# Altium PCB NEXUS32.PcbDoc (part 1 of 3)
Units mil, origin at the board's own origin, x right, y up, seen from the top; angles counter-clockwise.
Board outline 6299 x 4724 mil, 4 copper layers (Top Layer, L2_GND, L3_PWR, Bottom Layer), stack 63.6 mil thick; 220 components, 128 nets, 690 pads, 369 vias.
Unrouted connection lines stored in the file: 1.
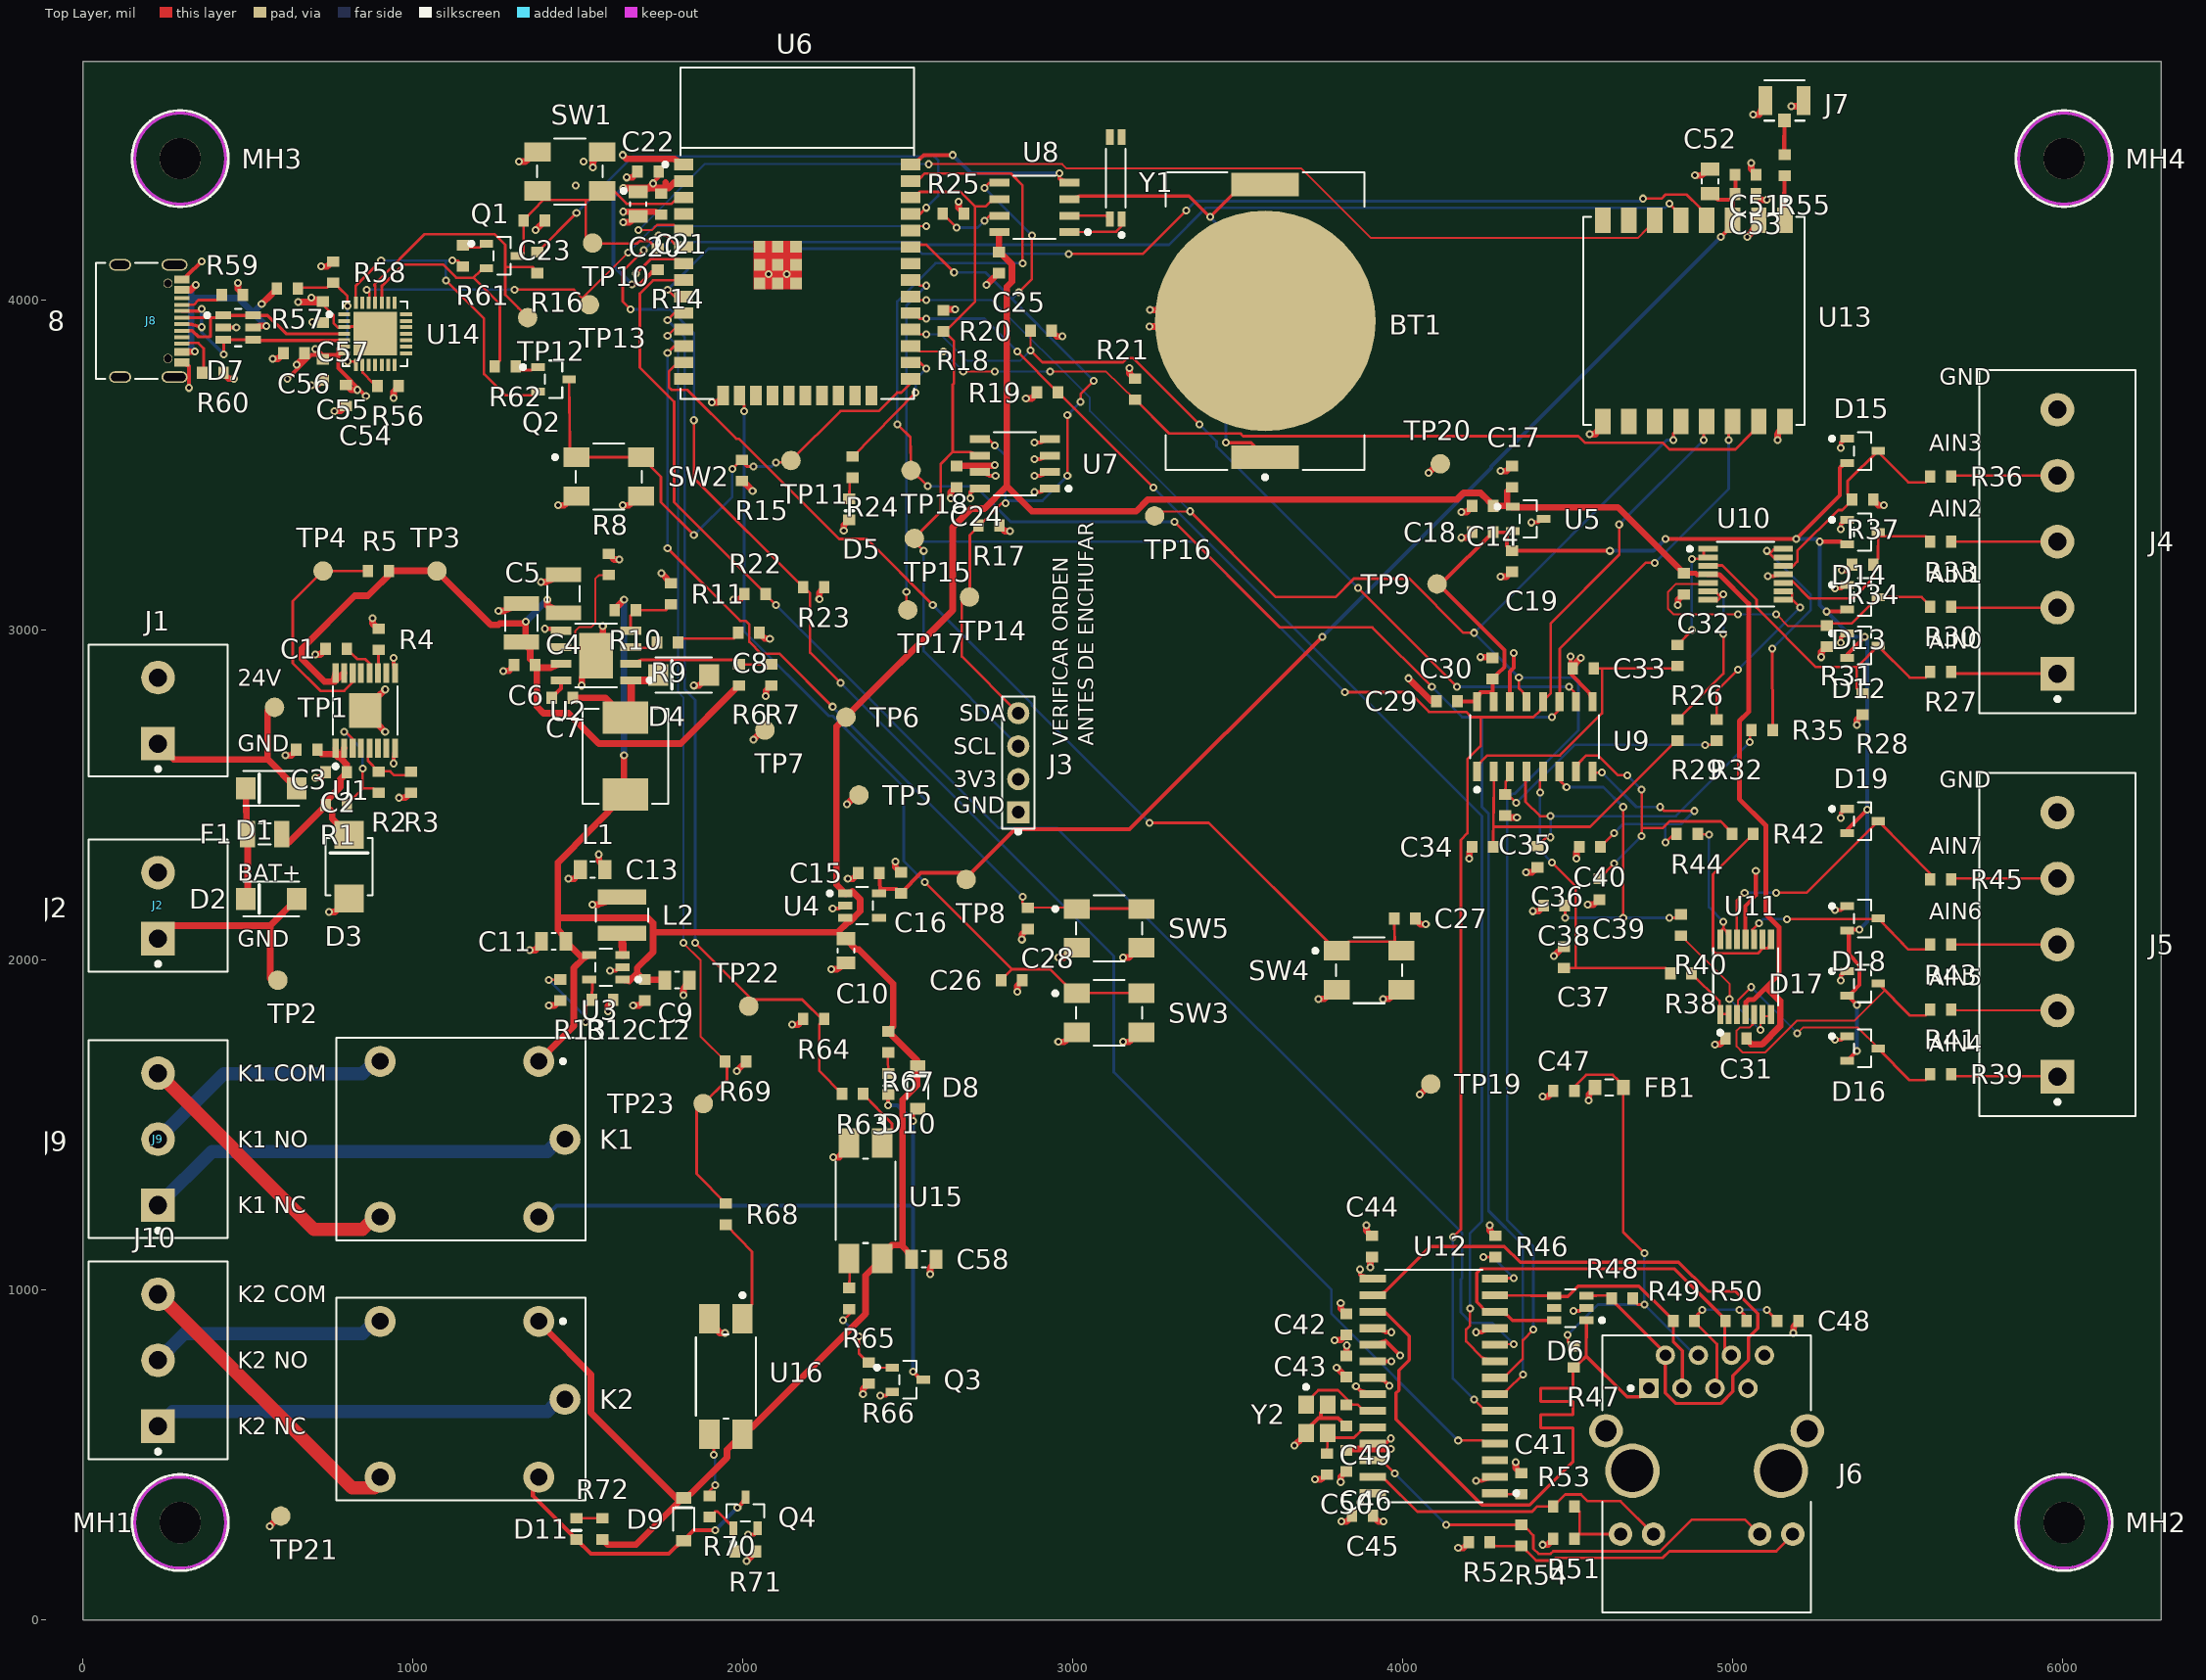
[diagram p0: Top Layer view]
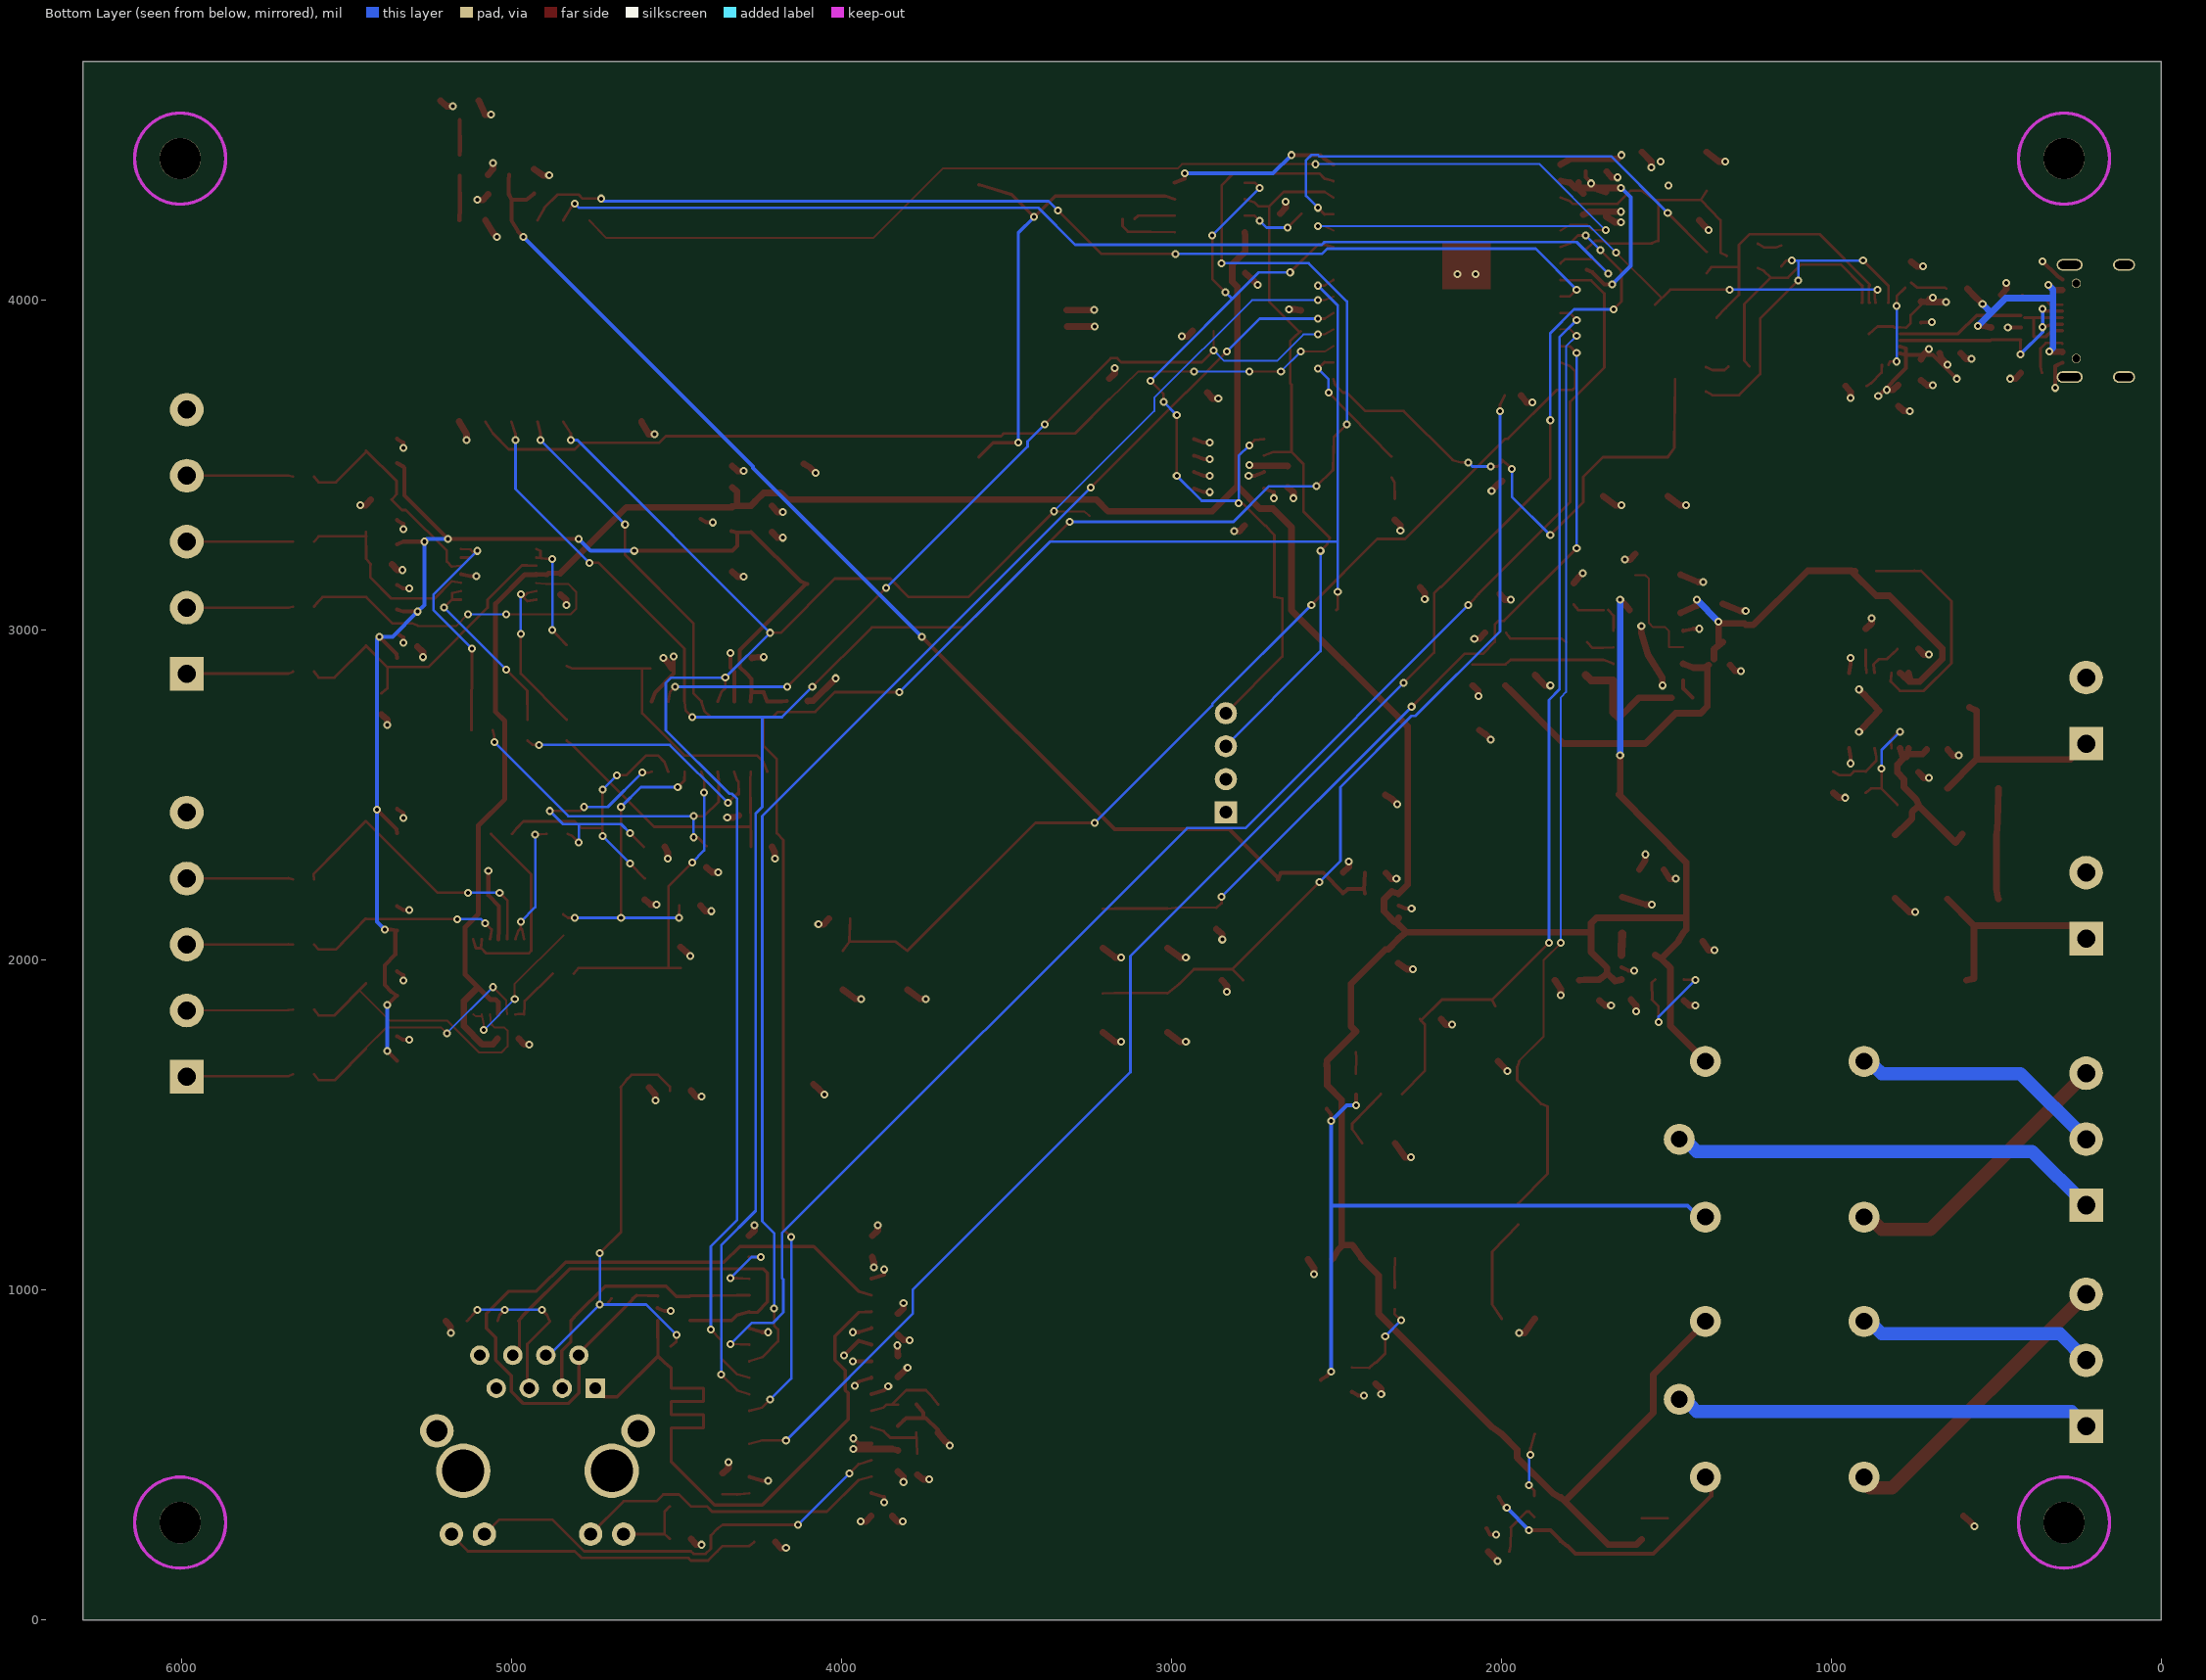
[diagram p1: Bottom Layer view, seen from below]
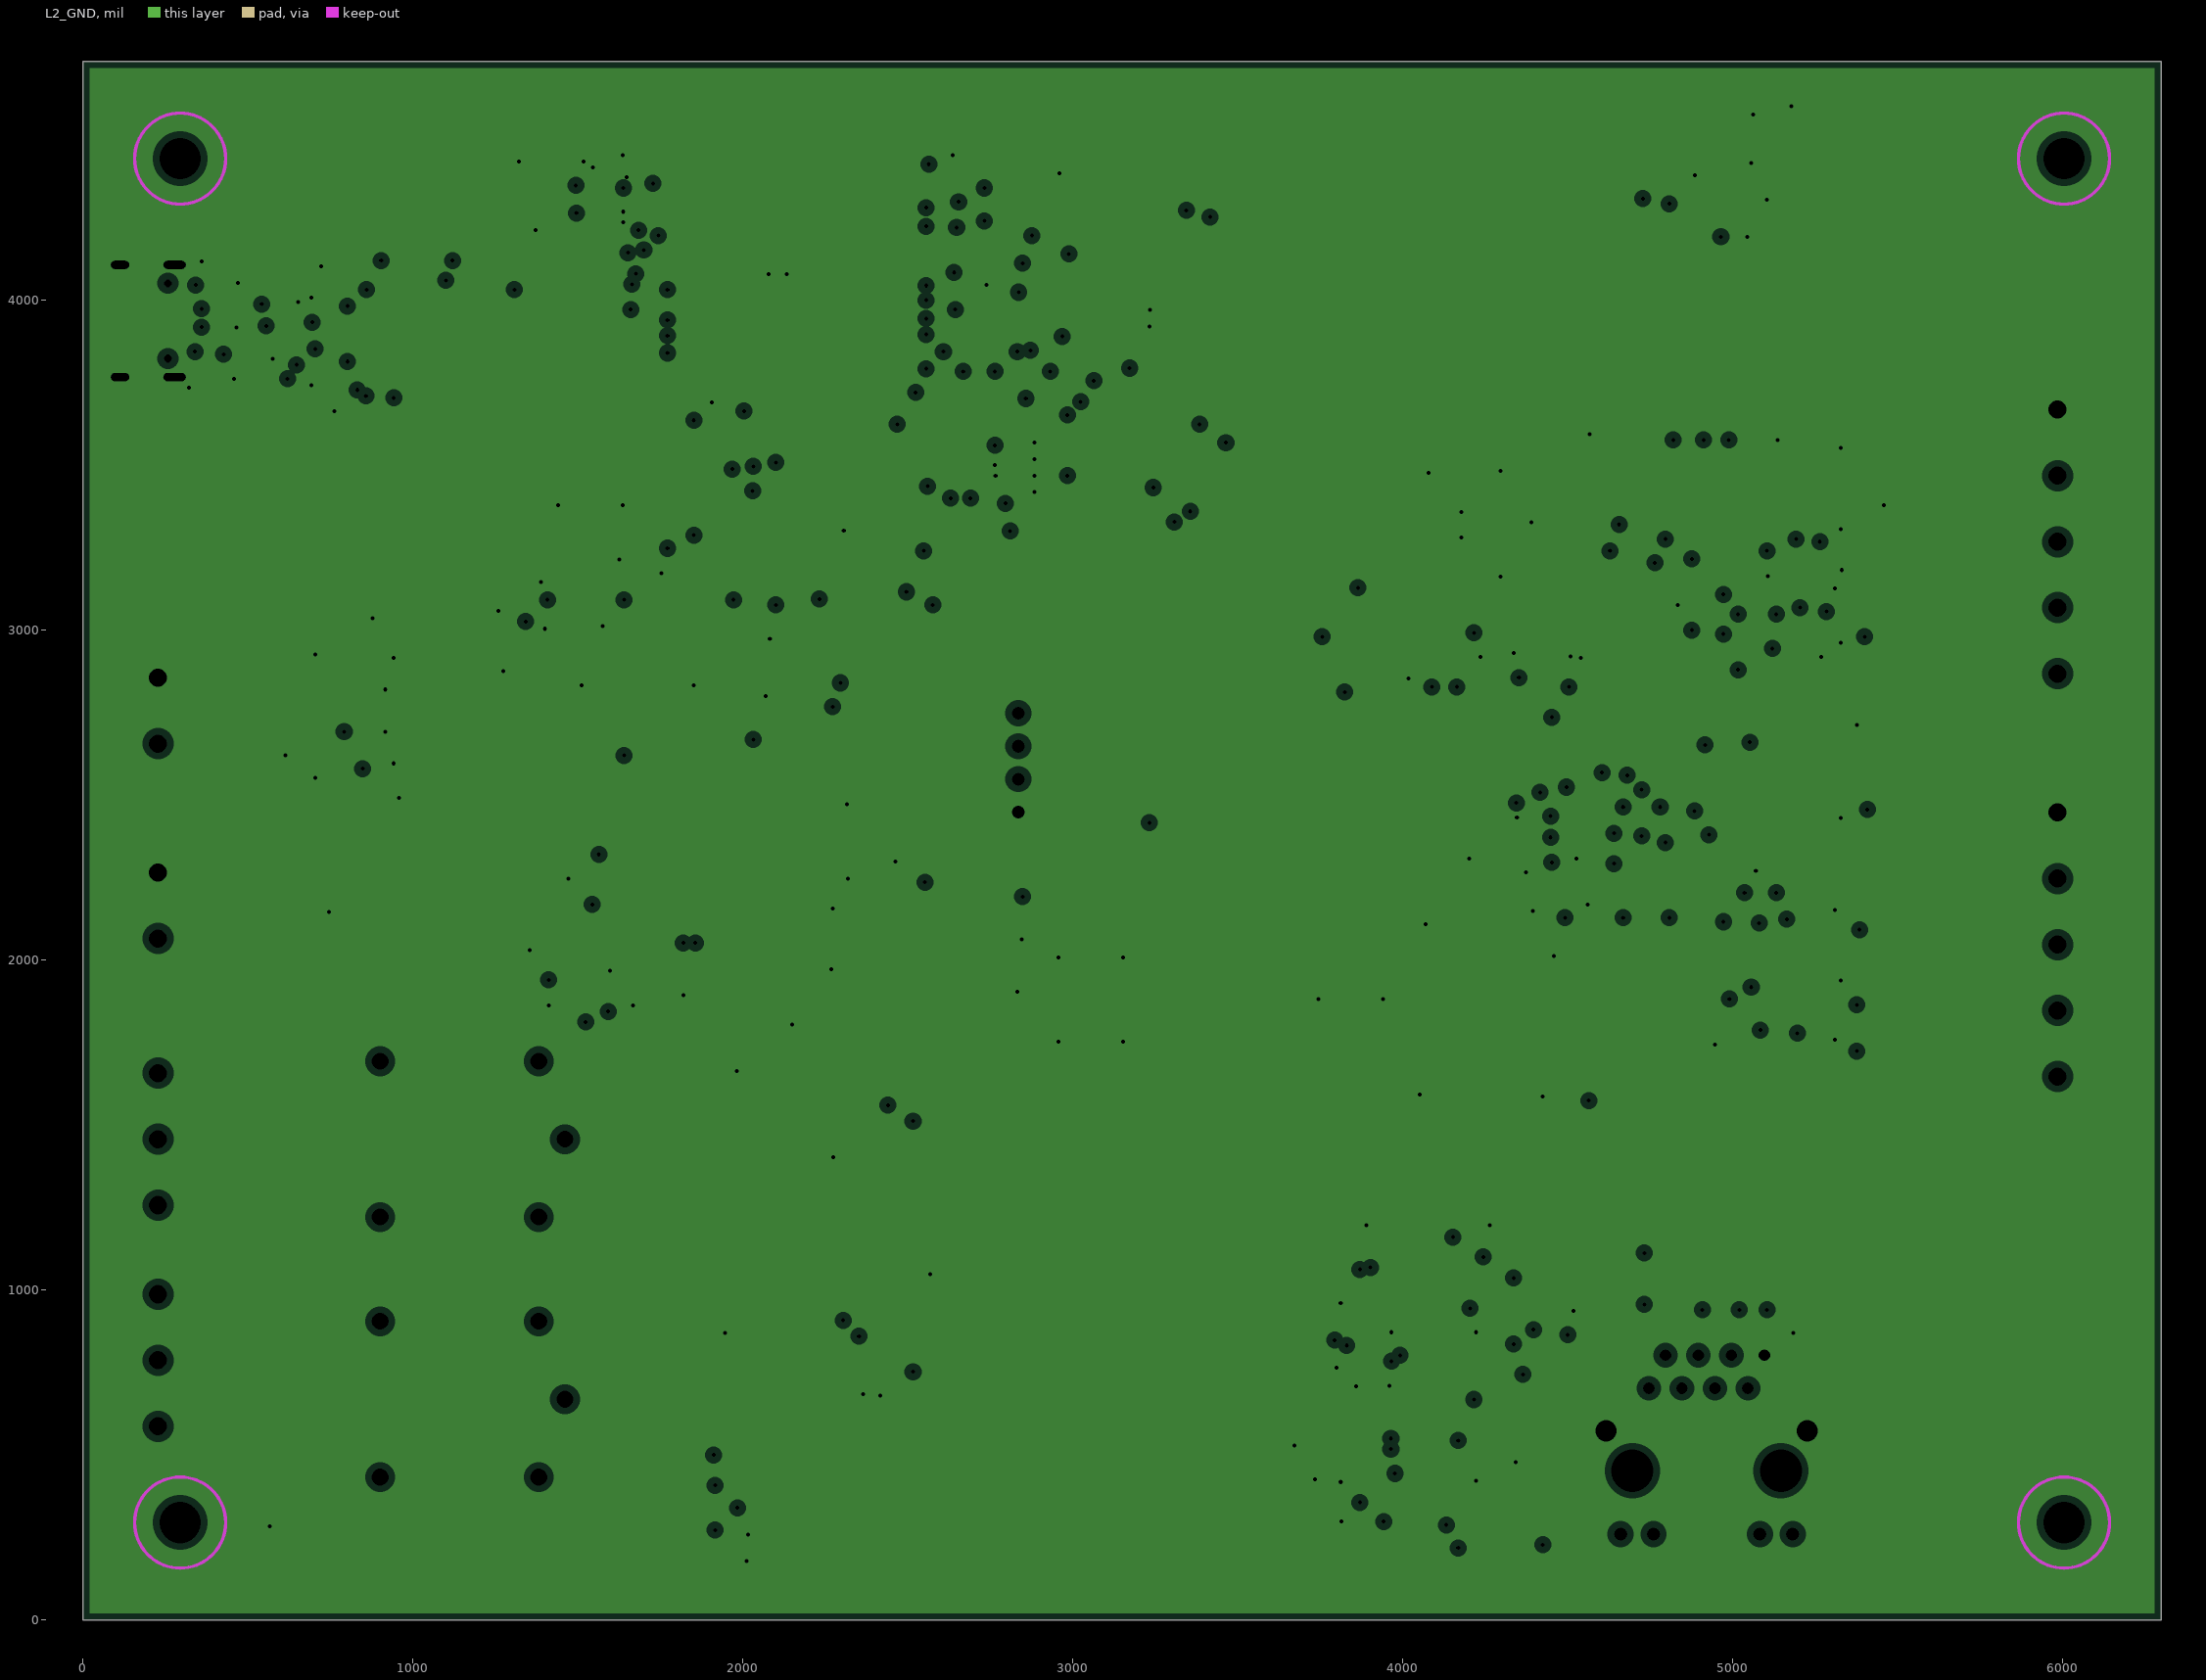
[diagram p2: L2_GND, clearances drawn from the general rule]
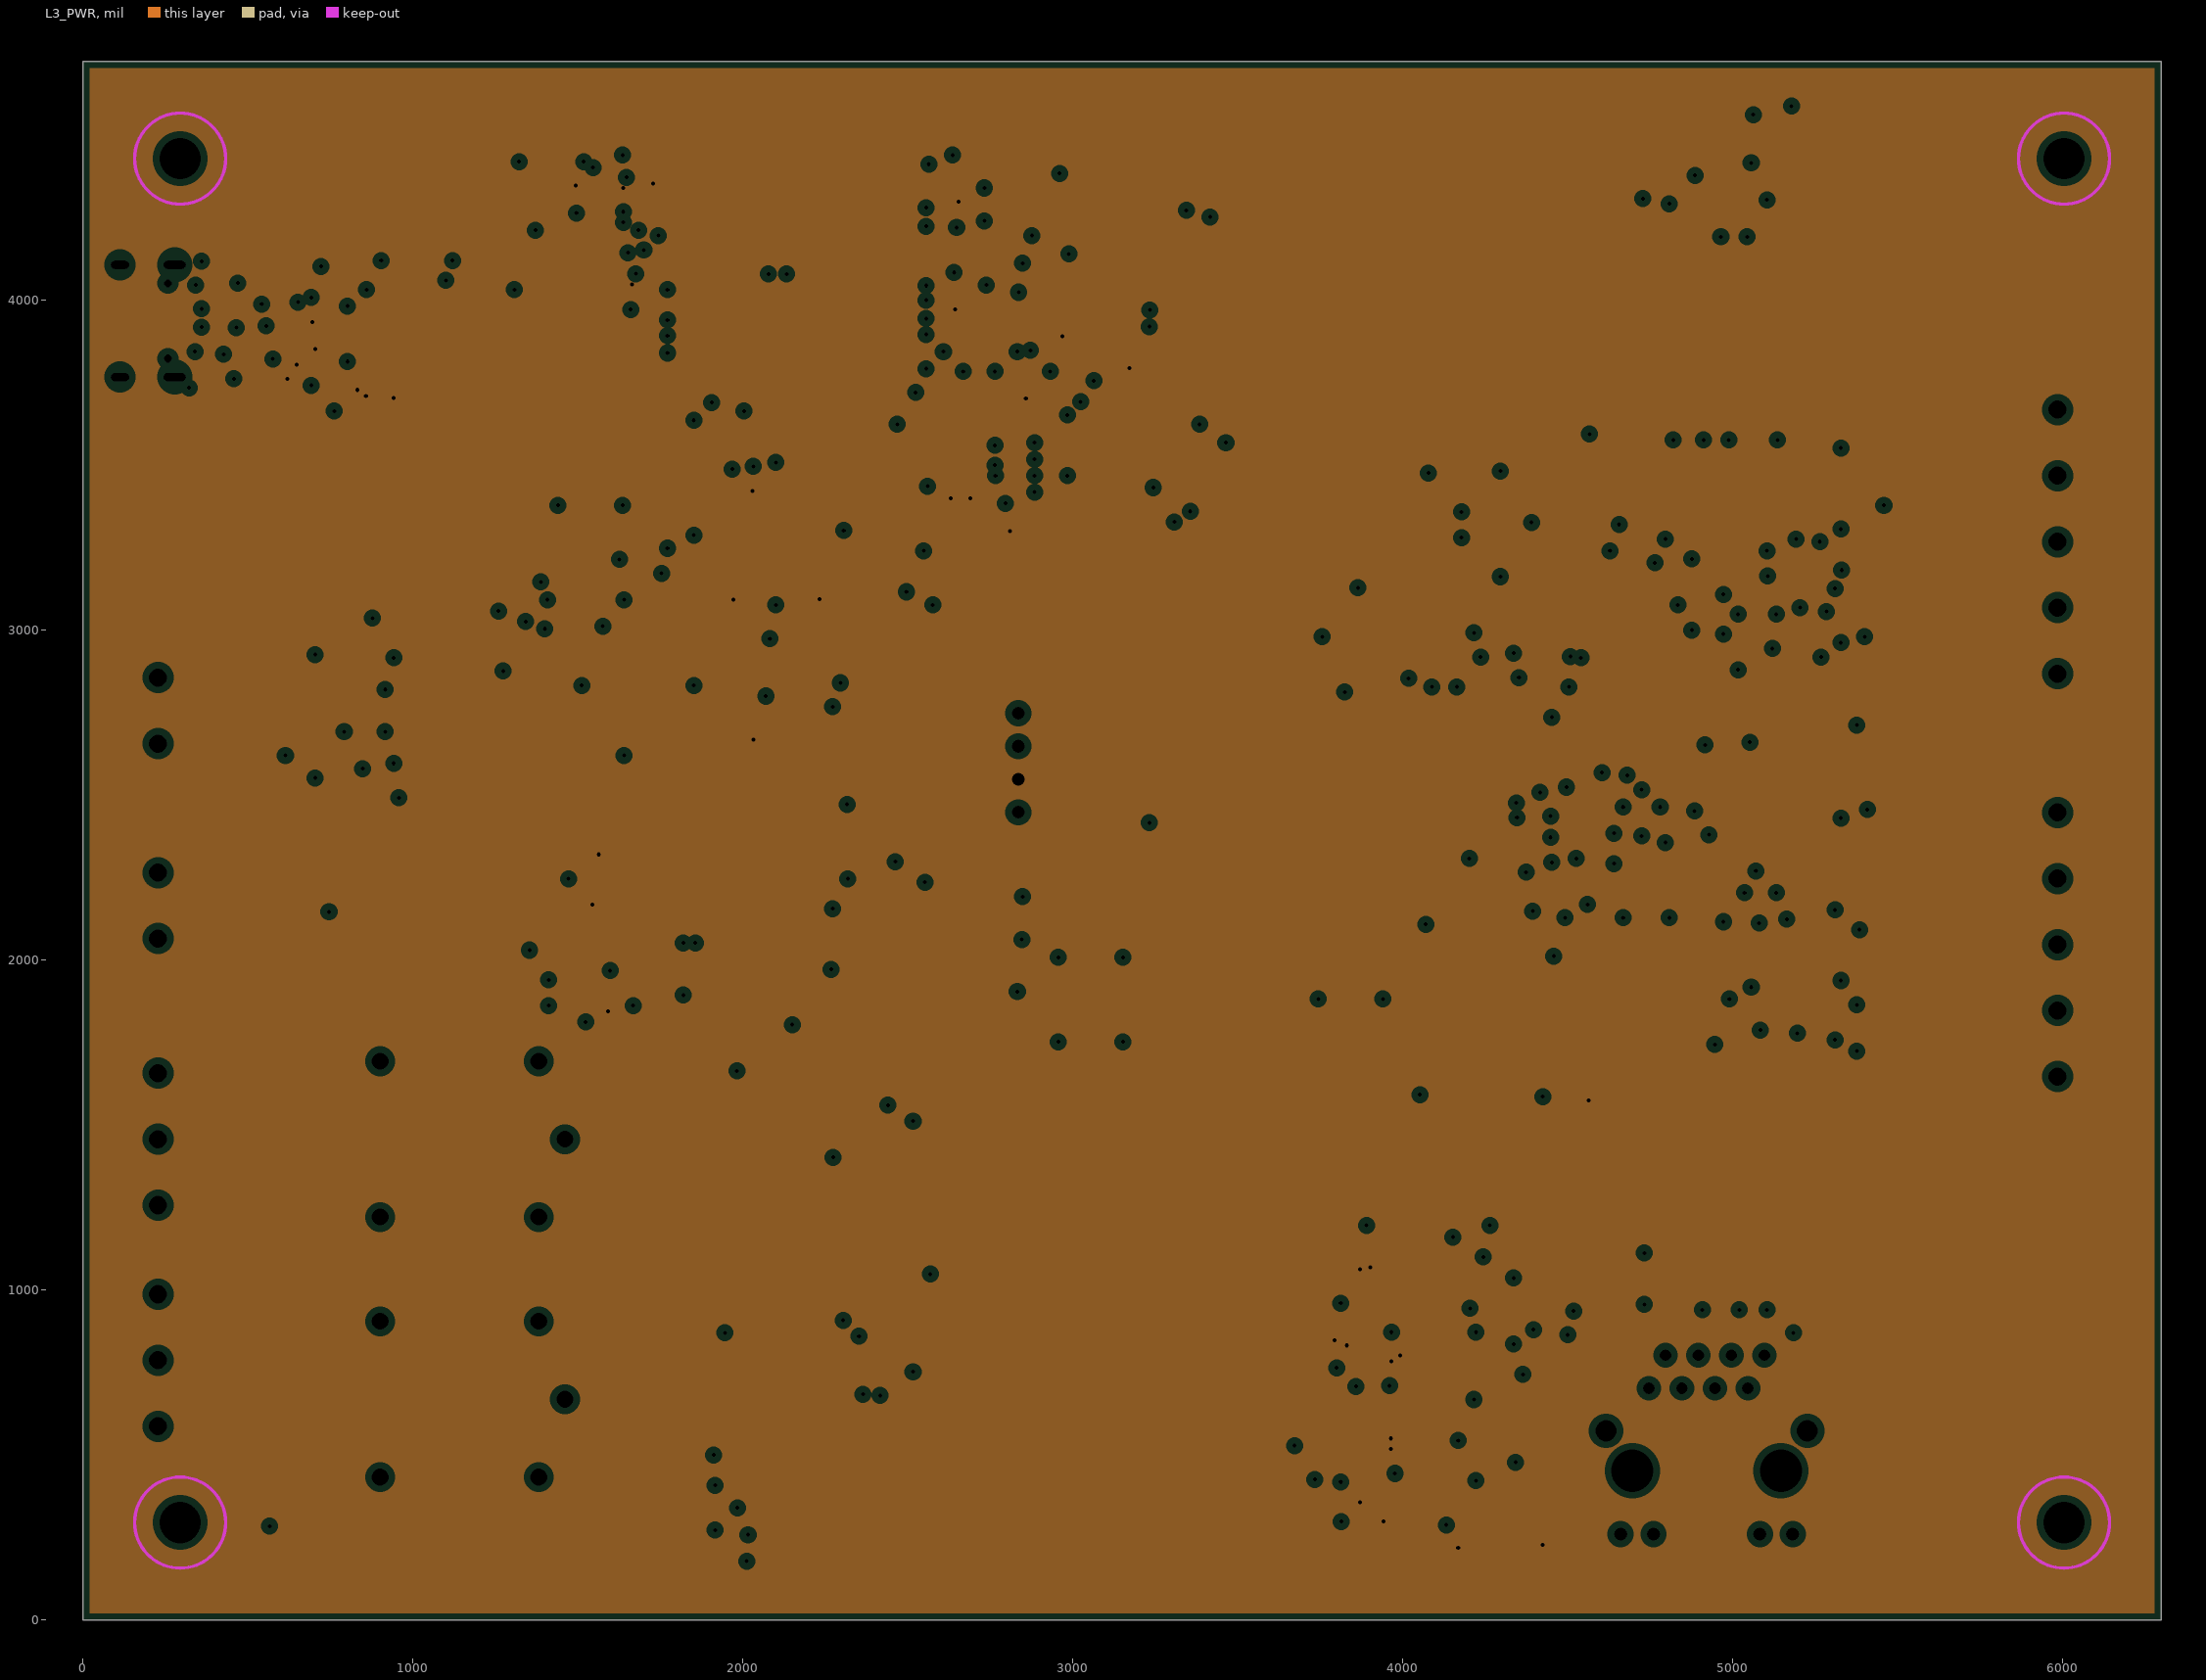
[diagram p3: L3_PWR, clearances drawn from the general rule]
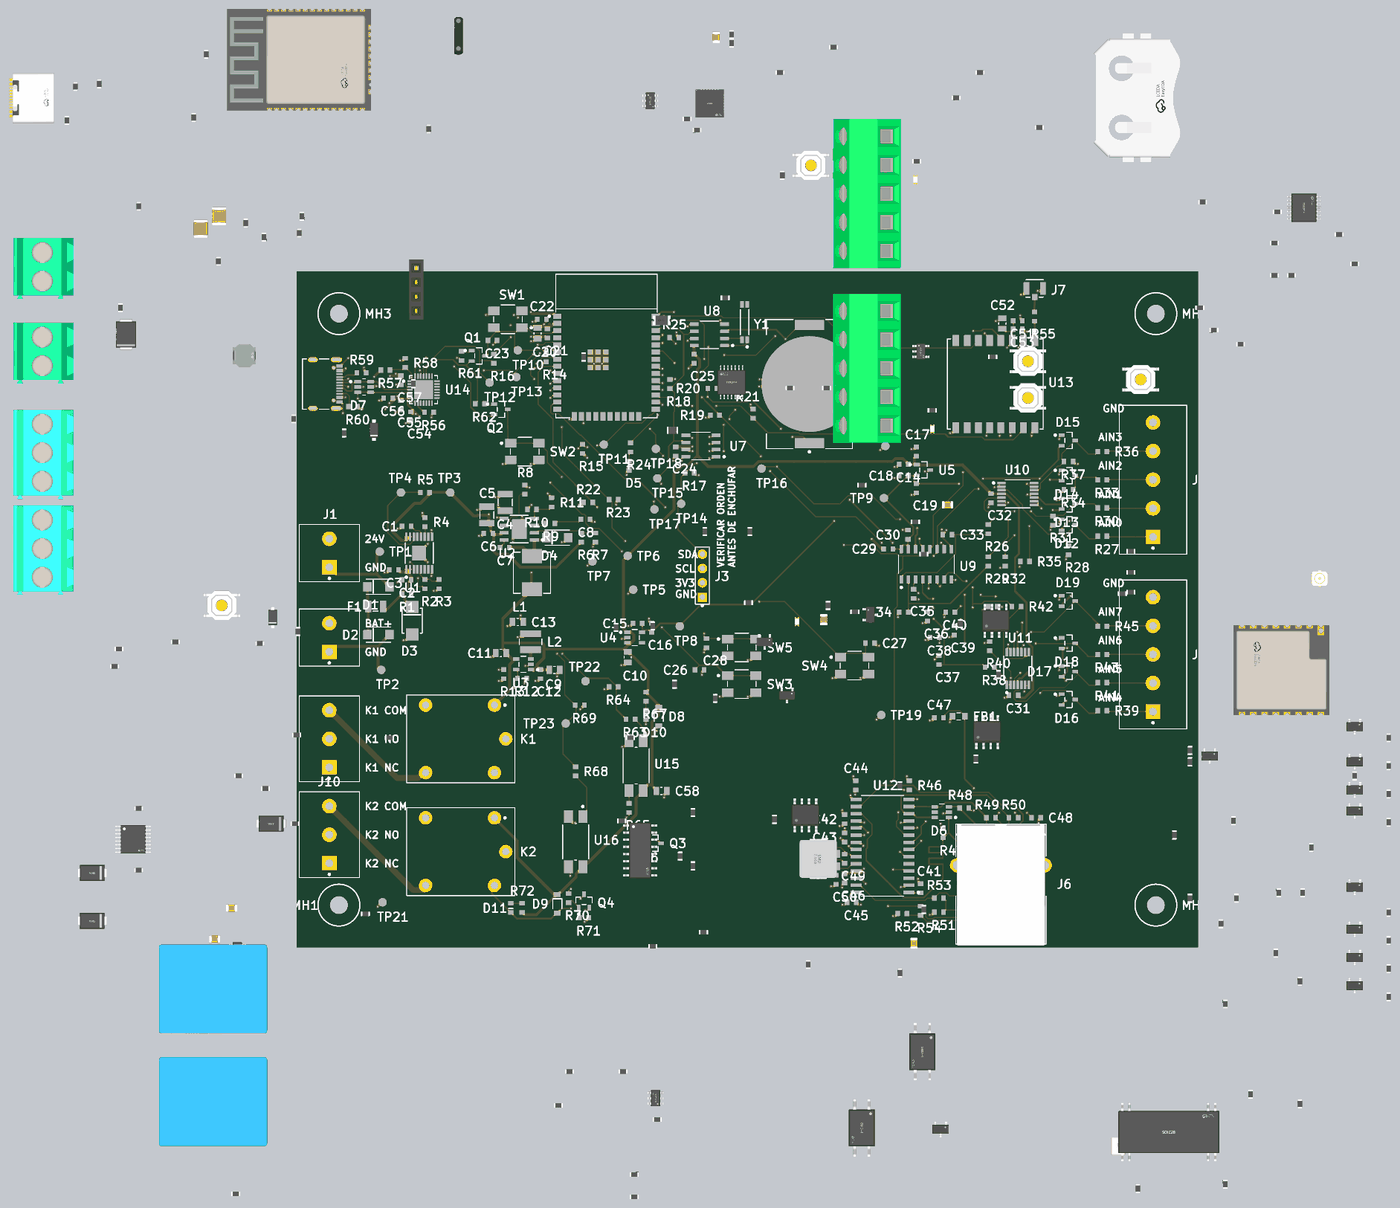
[diagram p5: 3D render of the assembled board from above, using the file's embedded part models]

## Layer stack, top to bottom
Top Solder: solder mask 0.4, Solder Resist, Dk 3.5
Top Layer: signal copper 1.4
Dielectric 1: prepreg 8, FR-4, Dk 4.4
L2_GND: plane copper 1.4, net GND
Dielectric2: core 42, FR-4, Dk 4.6
L3_PWR: plane copper 1.4, net V3V3
Dielectric3: prepreg 8, FR-4, Dk 4.4
Bottom Layer: signal copper 1.4
Bottom Solder: solder mask 0.4, Solder Resist, Dk 3.5

## Board outline
0,0 6299,0 6299,4724 0,4724

## Design rules (kind name [scope] priority, off if disabled: settings)
Clearance C_FINEPITCH_PADS [(InComponent('J8') Or InComponent('U1') Or InComponent('U10') Or InComponent('U11') Or InComponent('U14')) And IsPad] p1: gap=5 ignorepadtopadclearanceinfootprint=FALSE // pads de paso fino: J8 5.5 mil, U1/U10/U11/U14 7 mil entre pads (JLC min 3.5 mil)
Clearance C_ANALOG [InNetClass('ANALOG')] p2: gap=10 ignorepadtopadclearanceinfootprint=FALSE // guarda de 10 mil para las entradas/salidas analogicas
Clearance C_RELAY_CONTACTS [InNetClass('RELAY_CONTACTS')] p3: gap=20 ignorepadtopadclearanceinfootprint=FALSE // R1 sec.5: 20 mil entre contactos y frente al resto
Clearance C_PWR_HV [InNetClass('PWR_HV')] p4: gap=12 ignorepadtopadclearanceinfootprint=FALSE // R1 sec.5: 12 mil frente a cualquier otra red (hasta 28 V, 45 V de surge)
Clearance [All] p5: gap=8 ignorepadtopadclearanceinfootprint=FALSE // R2: 8 mil (JLCPCB min 3.5 mil; base de diseno 6/6; 8 da margen)
ComponentClearance [All] p1: gap=12 collisioncheckmode=3 verticalgap=10 showdistances=FALSE // R2: 0.3 mm entre cuerpos de componentes (R3, ensamblaje JLCPCB)
DiffPairsRouting [All] p1: maxlimit=10 minlimit=10 mostfreqgap=10 toplayer_minwidth=8 toplayer_maxwidth=14 toplayer_prefwidth=12 bottomlayer_minwidth=8 bottomlayer_maxwidth=14 bottomlayer_prefwidth=12 maxuncoupledlength=500
HoleSize [All] p1: absolutevalues=TRUE maxlimit=200 minlimit=12 maxpercent=80.000 minpercent=20.000 // R2: via/taladro min 0.30 mm; max 5 mm para los agujeros M3 (3.2 mm) y guias RJ45 (3.25 mm)
HoleToHoleClearance [All] p1: gap=18 allowstackedmicrovias=TRUE // R2: 0.45 mm entre taladros (R1 sec.4)
MinimumSolderMaskSliver [All] p1: minsoldermaskwidth=4
PlaneClearance [All] p1: clearance=20
PlaneConnect [All] p1: planeconnectstyle=Relief reliefexpansion=20 reliefentries=4 reliefconductorwidth=10 reliefairgap=10
PolygonConnect [All] p1: connectstyle=Relief reliefconductorwidth=10 reliefentries=4 polygonreliefangle="90 Angle" airgapwidth=10
RoutingVias [All] p1: holewidth=12 width=24 viastyle="Through Hole" minholewidth=12 minwidth=24 maxholewidth=12 maxwidth=24
SilkToSolderMaskClearance [IsPad] p1: minsilkscreentomaskgap=5.91 clearancetoexposedcopper=TRUE
SolderMaskExpansion SolderMaskExpansion_Vias [IsVia] p1: expansion=0 istentingtop=TRUE
SolderMaskExpansion SolderMaskExpansion_FinePitch [InComponent('J8') Or InComponent('U1') Or InComponent('U10') Or InComponent('U11') Or InComponent('U14')] p2: expansion=0 istentingtop=FALSE
SolderMaskExpansion [All] p3: expansion=2 istentingtop=FALSE
Width W_RF_50R [InNetClass('RF_50R')] p1: maxlimit=15 minlimit=13 preferedwidth=14 // R1: 50 ohm, 13.8 mil (entero: 14)
Width W_ETH_DIFF [InNetClass('ETH_DIFF')] p2: maxlimit=12 minlimit=8 preferedwidth=10 // R1: 100 ohm diferencial, w 10.4 mil / gap 10 mil (entero: 10)
Width W_USB_DIFF [InNetClass('USB_DIFF')] p3: maxlimit=14 minlimit=10 preferedwidth=12 // R1: 90 ohm diferencial, w 12.5 mil / gap 10 mil (entero: 12)
Width W_RELAY_CONTACTS [InNetClass('RELAY_CONTACTS')] p4: maxlimit=80 minlimit=30 preferedwidth=40 // R1: 40 mil minimo (2.4 A a +10 C), 60 mil donde quepa
Width W_SW_NODES [InNetClass('SW_NODES')] p5: maxlimit=60 minlimit=15 preferedwidth=24 // nodos de conmutacion MP1584/TLV62569: cobre corto y ancho
Width W_V3V3_RF [InNet('V3V3_RF')] p6: maxlimit=20 minlimit=10 preferedwidth=12 // R1: 12 mil, 0.12 A
Width W_PWR_3V3 [InNetClass('PWR_3V3')] p7: maxlimit=60 minlimit=12 preferedwidth=24 // R1: 24 mil (regla Espressif), 0.61 A max
Width W_PWR_5V0 [InNetClass('PWR_5V0')] p8: maxlimit=60 minlimit=15 preferedwidth=20 // R1: 20 mil, 0.72 A tipico / 1 A pico
Width W_PWR_HV [InNetClass('PWR_HV')] p9: maxlimit=60 minlimit=12 preferedwidth=20 // R1: 20 mil (1.46 A a +10 C), limite eFuse 1 A
Width [All] p10: maxlimit=100 minlimit=6 preferedwidth=8 // R2: min 6 mil (limite JLC 3.5, diseno 6), preferido 8; las clases de potencia/RF lo sobrescriben
22 further rules are at their usual default settings.

## Classes and differential pairs
net class SPI: CS_ADC CS_ENC CS_LORA MISO MOSI SCK
net class ANALOG: AIN0 AIN0_DIV AIN1 AIN1_DIV AIN2 AIN2_DIV AIN3 AIN3_DIV AIN4 AIN4_DIV AIN5 AIN5_DIV AIN6 AIN6_DIV AIN7 AIN7_DIV AOUT0 AOUT1 AOUT2 AOUT3 AOUT4 AOUT5 AOUT6 AOUT7 CH0 CH1 CH2 CH3 CH4 CH5 CH6 CH7
net class RF_50R: ANT_CON ANT_MOD
net class ETH_DIFF: TPIN_N TPIN_P TPOUT_N TPOUT_P
net class USB_DIFF: USB_DN USB_DP
net class RELAY_CONTACTS: K1_COM K1_NC K1_NO K2_COM K2_NC K2_NO
net class SW_NODES: SW3_N SW5_N
net class PWR_3V3: V3V3 V3V3_REF
net class PWR_5V0: V5V0 VBUS_USB
net class PWR_HV: VBAT VIN24 VIN_F VIN_OR VIN_PROT
component class 00_TOP_LEVEL: MH1 MH2 MH3 MH4
component class 11_DIGITAL_OUTPUTS: C58 D8 D9 D10 D11 J9 J10 K1 K2 Q3 Q4 R63 R64 R65 R66 R67 R68 R69 R70 R71 R72 TP21 TP22 TP23 U15 U16
component class 10_UART_USB: C54 C55 C56 C57 D7 J8 Q1 Q2 R56 R57 R58 R59 R60 R61 R62 U14
component class 09_SPI_LORA: C51 C52 C53 J7 R55 TP20 U13
component class 08_SPI_ETHERNET: C41 C42 C43 C44 C45 C46 C47 C48 C49 C50 D6 FB1 J6 R46 R47 R48 R49 R50 R51 R52 R53 R54 U12 Y2
component class 07_SPI_ADC: C29 C30 C31 C32 C33 C34 C35 C36 C37 C38 C39 C40 D12 D13 D14 D15 D16 D17 D18 D19 J4 J5 R26 R27 R28 R29 R30 R31 R32 R33 R34 R35 R36 R37 R38 R39 R40 R41 R42 R43 R44 R45 TP19 U9 U10 U11
component class 06_I2C_OLED: C26 C27 C28 J3 SW3 SW4 SW5
component class 05_I2C_RTC: BT1 C25 R25 U8 Y1
component class 04_I2C_EEPROM: C24 U7
component class 03_ESP32_CORE: C20 C21 C22 C23 D5 R14 R15 R16 R17 R18 R19 R20 R21 R22 R23 R24 SW1 SW2 TP10 TP11 TP12 TP13 TP14 TP15 TP16 TP17 TP18 U6
component class 02_POWER_REGULATION: C4 C5 C6 C7 C8 C9 C10 C11 C12 C13 C14 C15 C16 C17 C18 C19 D4 L1 L2 R6 R7 R8 R9 R10 R11 R12 R13 TP6 TP7 TP8 TP9 U2 U3 U4 U5
component class 01_INPUT_POWER: C1 C2 C3 D1 D2 D3 F1 J1 J2 R1 R2 R3 R4 R5 TP1 TP2 TP3 TP4 TP5 U1
differential pair ETH_RX: +TPIN_P -TPIN_N
differential pair ETH_TX: +TPOUT_P -TPOUT_N
differential pair USB: +USB_DP -USB_DN

## Components (designator, comment, footprint, x,y, rotation, side; value= is the part's Value field where it differs from the comment)
BT1 "CR2032" BAT-HLD-001 3583,3937 r90 top
C1 "47nF" R_0603 768,2943 r180 top
C2 "1uF" R_0603 768,2569 r180 top
C3 "100nF" R_0603 679,2638 r180 top
C4 "10uF" C_1210 1457,3110 r90 top
C5 "10uF" C_1210 1329,3022 r90 top
C6 "100nF" R_0603 1339,2894 r180 top
C7 "100nF" R_0603 1453,2795 r0 top
C8 "150pF" R_0603 2018,2992 r0 top
C9 "22uF" C_0805 1801,1939 r0 top
C10 "22uF" C_0805 2313,2028 r270 top
C11 "10uF" C_0805 1427,2057 r180 top
C12 "100nF" R_0603 1703,1909 r270 top
C13 "22uF" C_0805 1545,2274 r180 top
C14 "1uF" R_0603 4242,3376 r180 top
C15 "10uF" R_0603 2382,2264 r180 top
C16 "100nF" R_0603 2480,2234 r90 top
C17 "1uF" R_0603 4331,3465 r90 top
C18 "1uF" R_0603 4242,3297 r180 top
C19 "100nF" R_0603 4331,3209 r270 top
C20 "22uF" C_0805 1683,4291 r270 top
C21 "10uF" R_0603 1752,4291 r270 top
C22 "100nF" R_0603 1713,4390 r180 top
C23 "1uF" R_0603 1368,4242 r0 top
C24 "100nF" R_0603 2648,3465 r90 top
C25 "100nF" R_0603 2776,4114 r270 top
C26 "100nF" R_0603 2815,1939 r0 top
C27 "100nF" R_0603 4006,2126 r0 top
C28 "100nF" R_0603 2864,2126 r270 top
C29 "1uF" R_0603 4134,2785 r180 top
C30 "100nF" R_0603 4272,2884 r90 top
C31 "100nF" R_0603 5010,1762 r180 top
C32 "100nF" R_0603 4852,3140 r270 top
C33 "100nF" R_0603 4547,2884 r180 top
C34 "100nF" R_0603 4242,2343 r180 top
C35 "100nF" R_0603 4311,2470 r270 top
C36 "100nF" R_0603 4409,2313 r270 top
C37 "100nF" R_0603 4488,2008 r90 top
C38 "100nF" R_0603 4459,2165 r180 top
C39 "100nF" R_0603 4596,2215 r270 top
C40 "100nF" R_0603 4567,2343 r180 top
C41 "10uF" R_0603 4360,413 r90 top
C42 "100nF" R_0603 3829,896 r90 top
C43 "100nF" R_0603 3829,768 r270 top
C44 "100nF" R_0603 3907,1132 r90 top
C45 "100nF" R_0603 3878,315 r180 top
C46 "100nF" R_0603 3829,482 r270 top
C47 "100nF" R_0603 4488,1604 r180 top
C48 "100nF" R_0603 5167,906 r0 top
C49 "18pF" R_0603 3829,620 r270 top
C50 "18pF" R_0603 3770,472 r270 top
C51 "10uF" R_0603 5039,4380 r0 top
C52 "22uF" C_0805 4931,4360 r90 top
C53 "100nF" R_0603 5039,4321 r0 top
C54 "4.7uF" R_0603 797,3711 r270 top
C55 "100nF" R_0603 728,3789 r270 top
C56 "4.7uF" R_0603 640,3839 r180 top
C57 "100nF" R_0603 728,3964 r90 top
C58 "10uF" C_0805 2549,1093 r0 top
D1 "SS56" D_SMA 571,2520 r180 top
D2 "SS56" D_SMA 571,2185 r180 top
D3 "SMBJ28A" D_SMB 807,2283 r90 top
D4 "SS56" D_SMA 1821,2864 r180 top
D5 "LED usuario" LED_0603 2323,3366 r270 top
D6 "SRV05-4.TCT" SOT-23-6_SRV05-4 4508,945 r180 top
D7 "USBLC6-2SC6" SOT-23-6_USBLC6 471,3917 r0 top
D8 "1N4148W" D_SOD-123 2530,1614 r90 top
D9 "1N4148W" D_SOD-123 1821,305 r90 top
D10 "LED rele 1" LED_0603 2441,1624 r270 top
D11 "LED rele 2" LED_0603 1496,276 r270 top
D12 "BAT54S" SOT-23-3_DBZ 5394,2953 r0 top
D13 "BAT54S" SOT-23-3_DBZ 5394,3100 r0 top
D14 "BAT54S" SOT-23-3_DBZ 5394,3297 r0 top
D15 "BAT54S" SOT-23-3_DBZ 5394,3543 r0 top
D16 "BAT54S" SOT-23-3_DBZ 5394,1732 r0 top
D17 "BAT54S" SOT-23-3_DBZ 5394,1929 r0 top
D18 "BAT54S" SOT-23-3_DBZ 5394,2126 r0 top
D19 "BAT54S" SOT-23-3_DBZ 5394,2421 r0 top
F1 "2 A / 63 V" F_1206 551,2382 r0 top
FB1 "BLM21PG221SN1D" FB_0805 4626,1614 r0 top
J1 "24 VDC" TB_KF128-5.08-2P 228,2756 r90 top
J2 "BATERIA 12 V" TB_KF128-5.08-2P 228,2165 r90 top
J3 "OLED SH1106" HDR_1x4_P2.54_F 2835,2598 r90 top
J4 "ENTRADAS 0-10 V" TB_DB127S-5.08-5P 5984,3268 r90 top
J5 "ENTRADAS 0-3.3 V" TB_DB127S-5.08-5P 5984,2047 r90 top
J6 "HR911105A" RJ45_HR911105A 4921,528 r180 top
J7 "ANTENA 915 MHz" UFL_R_SMT_1 5157,4586 r0 top
J8 "TYPE-C-31-M-12" USB-C_TYPE-C-31-M-12 201,3937 r270 top
J9 "CONTACTOS K1" TB_KF128-5.08-3P 228,1457 r90 top
J10 "CONTACTOS K2" TB_KF128-5.08-3P 228,787 r90 top
K1 "RELE 1" RELAY_SRD-05VDC-SL-C 1181,1457 r180 top
K2 "RELE 2" RELAY_SRD-05VDC-SL-C 1181,669 r180 top
L1 "22uH" L_SRP7050TA 1644,2618 r270 top
L2 "2.2uH" L_NRS4018 1634,2136 r90 top
MH1 "MOUNTING_HOLE_M3" MH_M3 295,295 r0 top
MH2 "MOUNTING_HOLE_M3" MH_M3 6004,295 r0 top
MH3 "MOUNTING_HOLE_M3" MH_M3 295,4429 r0 top
MH4 "MOUNTING_HOLE_M3" MH_M3 6004,4429 r0 top
Q1 "S8050-J3Y" SOT-23-3_DBZ 1270,4134 r0 top
Q2 "S8050-J3Y" SOT-23-3_DBZ 1427,3760 r0 top
Q3 "AO3400A" SOT-23-3_DBZ 2500,728 r0 top
Q4 "AO3400A" SOT-23-3_DBZ 2008,325 r90 top
R1 "590k" R_0603 768,2470 r0 top
R2 "60.4k" R_0603 896,2539 r90 top
R3 "30.1k" R_0603 994,2539 r270 top
R4 "11.8k" R_0603 896,2972 r90 top
R5 "100k" R_0603 896,3179 r0 top
R6 "100k" R_0603 1988,2864 r90 top
R7 "22.1k" R_0603 2087,2864 r270 top
R8 "100k" R_0603 1594,3199 r90 top
R9 "100k" R_0603 1772,2963 r0 top
R10 "210k" R_0603 1644,3061 r0 top
R11 "40.2k" R_0603 1782,3110 r90 top
R12 "453k" R_0603 1575,1880 r180 top
R13 "100k" R_0603 1447,1909 r270 top
R14 "10k" R_0603 1742,4124 r90 top
R15 "10k" R_0603 1998,3484 r90 top
R16 "499" R_0603 1378,4114 r270 top
R17 "4.7k" R_0603 2746,3317 r180 top
R18 "4.7k" R_0603 2608,3937 r270 top
R19 "10k" R_0603 2923,3720 r0 top
R20 "10k" R_0603 2904,3907 r180 top
R21 "10k" R_0603 3189,3730 r270 top
R22 "10k" R_0603 2037,3110 r0 top
R23 "10k" R_0603 2215,3130 r180 top
R24 "1k" R_0603 2333,3494 r270 top
R25 "10k" R_0603 2638,4262 r180 top
R26 "1k" R_0603 4833,2923 r270 top
R27 "100k" R_0603 5630,2874 r180 top
R28 "43.2k" R_0603 5394,2776 r270 top
R29 "1k" R_0603 4833,2697 r270 top
R30 "100k" R_0603 5630,3071 r180 top
R31 "43.2k" R_0603 5285,2982 r270 top
R32 "1k" R_0603 4951,2697 r270 top
R33 "100k" R_0603 5630,3268 r180 top
R34 "43.2k" R_0603 5394,3199 r180 top
R35 "1k" R_0603 5089,2697 r180 top
R36 "100k" R_0603 5630,3465 r180 top
R37 "43.2k" R_0603 5394,3396 r0 top
R38 "1k" R_0603 4843,1959 r180 top
R39 "10k" R_0603 5630,1654 r180 top
R40 "1k" R_0603 4843,2106 r90 top
R41 "10k" R_0603 5630,1850 r180 top
R42 "1k" R_0603 5030,2382 r180 top
R43 "10k" R_0603 5630,2047 r180 top
R44 "1k" R_0603 4862,2382 r180 top
R45 "10k" R_0603 5630,2244 r180 top
R46 "2.32k" R_0603 4281,1132 r90 top
R47 "49.9" R_0603 4518,797 r90 top
R48 "49.9" R_0603 4665,974 r180 top
R49 "49.9" R_0603 4852,906 r0 top
R50 "49.9" R_0603 5010,906 r180 top
R51 "330" R_0603 4488,246 r0 top
R52 "330" R_0603 4232,236 r0 top
R53 "10k" R_0603 4488,344 r180 top
R54 "10k" R_0603 4360,256 r90 top
R55 "0" R_0603 5157,4409 r90 top
R56 "1k" R_0603 925,3740 r180 top
R57 "22.1k" R_0603 620,4035 r0 top
R58 "47.5k" R_0603 758,4085 r90 top
R59 "5.1k" R_0603 453,4016 r0 top
R60 "5.1k" R_0603 394,3780 r0 top
R61 "10k" R_0603 1152,4134 r90 top
R62 "10k" R_0603 1280,3799 r0 top
R63 "330" R_0603 2333,1594 r0 top
R64 "10k" R_0603 2215,1821 r180 top
R65 "2.2k" R_0603 2323,974 r270 top
R66 "100k" R_0603 2382,748 r270 top
R67 "1k" R_0603 2441,1752 r270 top
R68 "330" R_0603 1949,1230 r270 top
R69 "10k" R_0603 1978,1693 r0 top
R70 "2.2k" R_0603 1900,344 r270 top
R71 "100k" R_0603 2008,207 r0 top
R72 "1k" R_0603 1575,276 r90 top
SW1 "RESET" SW_TS-1187A 1476,4390 r180 top
SW2 "BOOT" SW_TS-1187A 1594,3465 r0 top
SW3 "ARRIBA" SW_TS-1187A 3110,1840 r0 top
SW4 "ABAJO" SW_TS-1187A 3898,1969 r0 top
SW5 "OK" SW_TS-1187A 3110,2096 r0 top
TP1 "TP_VIN24" TP_PAD_1.5mm 581,2766 r0 top
TP2 "TP_VBAT" TP_PAD_1.5mm 591,1939 r0 top
TP3 "TP_VIN_PROT" TP_PAD_1.5mm 1073,3179 r0 top
TP4 "TP_FLT" TP_PAD_1.5mm 728,3179 r0 top
TP5 "TP_GND" TP_PAD_1.5mm 2352,2500 r0 top
TP6 "TP_5V0" TP_PAD_1.5mm 2313,2736 r0 top
TP7 "TP_3V3" TP_PAD_1.5mm 2067,2697 r0 top
TP8 "TP_3V3_RF" TP_PAD_1.5mm 2677,2244 r0 top
TP9 "TP_3V3_REF" TP_PAD_1.5mm 4104,3140 r0 top
TP10 "TP_EN" TP_PAD_1.5mm 1545,4173 r90 top
TP11 "TP_IO0" TP_PAD_1.5mm 2146,3514 r90 top
TP12 "TP_TXD0" TP_PAD_1.5mm 1348,3947 r90 top
TP13 "TP_RXD0" TP_PAD_1.5mm 1535,3986 r90 top
TP14 "TP_SDA" TP_PAD_1.5mm 2687,3100 r90 top
TP15 "TP_SCL" TP_PAD_1.5mm 2520,3278 r90 top
TP16 "TP_SCK" TP_PAD_1.5mm 3248,3346 r90 top
TP17 "TP_MISO" TP_PAD_1.5mm 2500,3061 r90 top
TP18 "TP_MOSI" TP_PAD_1.5mm 2510,3484 r90 top
TP19 "TP_GND" TP_PAD_1.5mm 4085,1624 r90 top
TP20 "TP_GND" TP_PAD_1.5mm 4114,3504 r90 top
TP21 "TP_GND" TP_PAD_1.5mm 600,315 r90 top
TP22 "TP_RLY1" TP_PAD_1.5mm 2018,1860 r90 top
TP23 "TP_RLY2" TP_PAD_1.5mm 1880,1565 r90 top
U1 "TPS26600PWPR" HTSSOP-16-EP_PWP_P0.65 856,2756 r90 top
U2 "MP1584EN-LF-Z" SOIC-8-EP_MP1584 1555,2923 r180 top
U3 "TLV62569DBVR" SOT-23-5_DBV 1585,1978 r180 top
U4 "TLV75533PDBVR" SOT-23-5_DBV 2362,2165 r0 top
U5 "REF3033AIDBZR" SOT-23-3_DBZ 4380,3337 r0 top
U6 "ESP32-WROOM-32E-N4" ESP32-WROOM-32E 2165,4055 r0 top
U7 "AT24C256C-SSHL-T" SOIC-8_3.9x4.9_P1.27 2825,3504 r180 top
U8 "DS1307Z+" SOIC-8_3.9x4.9_P1.27 2884,4281 r180 top
U9 "MCP3208-CI/SL" SOIC-16_3.9x9.9_P1.27 4400,2677 r90 top
U10 "TLV9004IPWR" TSSOP-14_PW_P0.65 5039,3169 r0 top
U11 "TLV9004IPWR" TSSOP-14_PW_P0.65 5039,1949 r90 top
U12 "ENC28J60-I/SO" SOIC-28W_7.5x17.9_P1.27 4094,709 r180 top
U13 "Ra-01H" MODULE_Ra-01H 4882,3937 r270 top
U14 "CP2102N-A02-GQFN28R" QFN-28-EP_5x5_P0.5 886,3898 r0 top
U15 "PC817X2CSP9F" SOP-4_PC817X_L10.16 2372,1270 r270 top
U16 "PC817X2CSP9F" SOP-4_PC817X_L10.16 1949,738 r270 top
Y1 "32.768 kHz" XTAL_MC-146 3130,4370 r90 top
Y2 "25 MHz" XTAL_3225_4P 3740,610 r270 top

## Footprints (in the part's own frame and the unit in brackets; to place one, negate y for a bottom-side part, rotate by r counter-clockwise, add the part's x,y. Pads: shape width x height; smd on the part's side, far side on the other; paste and mask are expansions set on the pad)
BAT-HLD-001 [mil] "Portapilas CR2032 SMD TE BAT-HLD-001; pad 1 = (+) pestanas laterales, pad 2 = (-) pad central 17mm"
  rect 71x205 smd: 1(-413,0) 1(413,0)
  round 669 smd: 2(0,0)
  silkscreen extent -480,-301 451,301, body extent -451,-301 451,306, height 165
C_0805 [mil] "Condensador/ferrita 0805 (2012 metrico)"
  rect 39x57 smd: 1(-37,0) 2(37,0)
  silkscreen extent -6,-25 6,25, body extent -39,-26 39,26, height 51
C_1210 [mil] "Condensador 1210 (3225 metrico)"
  rect 45x106 smd: 1(-58,0) 2(58,0)
  silkscreen extent -24,-49 24,49, body extent -63,-49 63,49, height 98
D_SMA [mil] "Diodo SMA (DO-214AC) SS54; pad 1 = anodo, pad 2 = catodo (barra junto al pad 2)"
  rect 60x66 smd: 1(-77,0) 2(77,0)
  silkscreen extent -85,-53 85,53, body extent -102,-55 102,55, height 83
D_SMB [mil] "Diodo TVS SMB (DO-214AA) SMBJ28A; pad 1 = anodo, pad 2 = catodo (barra junto al pad 2)"
  rect 85x89 smd: 1(-96,0) 2(96,0)
  silkscreen extent -87,-71 87,71, body extent -106,-71 106,71, height 83
D_SOD-123 [mil] "Diodo SOD-123 (1N4148W); pad 1 = anodo, pad 2 = catodo (barra junto al pad 2)"
  rect 35x47 smd: 1(-65,0) 2(65,0)
  silkscreen extent -35,-32 35,32, body extent -75,-36 75,27, height 43
ESP32-WROOM-32E [mil] "Modulo ESP32-WROOM-32E 18 x 25.5 (38 pines + pad GND 39 en 3x3); antena arriba"
  rect 59x35 smd: 1(-344,356) 2(-344,306) 3(-344,256) 4(-344,206) 5(-344,156) 6(-344,106) 7(-344,56) 8(-344,6) 9(-344,-44) 10(-344,-94) 11(-344,-144) 12(-344,-194) 13(-344,-244) 14(-344,-294) 25(344,-294) 26(344,-244) 27(344,-194) 28(344,-144) 29(344,-94) 30(344,-44) 31(344,6) 32(344,56) 33(344,106) 34(344,156) 35(344,206) 36(344,256) 37(344,306) 38(344,356)
  rect 35x59 smd: 15(-225,-344) 16(-175,-344) 17(-125,-344) 18(-75,-344) 19(-25,-344) 20(25,-344) 21(75,-344) 22(125,-344) 23(175,-344) 24(225,-344)
  rect 35x35 smd: 39(-114,-4) 39(-114,52) 39(-114,107) 39(-59,-4) 39(-59,52) 39(-59,107) 39(-4,-4) 39(-4,52) 39(-4,107)
  silkscreen extent -406,-354 354,650, body extent -354,-353 354,651, height 122
F_1206 [mil] "Fusible 1206 Littelfuse 0466"
  rect 45x80 smd: 1(-52,0) 2(52,0)
  silkscreen extent -18,-32 18,32, body extent -63,-33 63,33, height 24
FB_0805 [mil] "Ferrita 0805 Murata BLM21PG"
  rect 39x47 smd: 1(-43,0) 2(43,0)
  silkscreen extent -12,-25 12,25, body extent -26,-39 26,39, height 24
HDR_1x4_P2.54_F [mil] "Cabezal hembra 1x4 2.54 (modulo OLED); pin 1 cuadrado (GND)"
  rect 67x67 hole 39: 1(-150,0)
  round 67 hole 39: 2(-50,0) 3(50,0) 4(150,0)
  silkscreen extent -215,-49 200,49, body extent -210,-49 210,49, height 335
HTSSOP-16-EP_PWP_P0.65 [mil] "HTSSOP-16 PowerPAD TPS26600PWPR"
  rect 59x18 smd: 1(-114,90) 2(-114,64) 3(-114,38) 4(-114,13) 5(-114,-13) 6(-114,-38) 7(-114,-64) 8(-114,-90) 9(114,-90) 10(114,-64) 11(114,-38) 12(114,-13) 13(114,13) 14(114,38) 15(114,64) 16(114,90)
  rect 105x97 smd: 17(0,0)
  silkscreen extent -175,-98 73,98, body extent -127,-98 125,98, height 48
L_NRS4018 [mil] "Inductor 4x4 Taiyo Yuden NRS4018 - recommended land pattern p.52"
  rect 47x146 smd: 1(-55,0) 2(55,0)
  silkscreen extent -20,-79 20,79, body extent -79,-79 79,79, height 72
L_SRP7050TA [mil] "Inductor 7.3x6.6 Bourns SRP7050TA - recommended layout p.1"
  rect 98x138 smd: 1(-116,0) 2(116,0)
  silkscreen extent -144,-130 144,130, body extent -140,-130 140,130, height 114
LED_0603 [mil] "LED 0603; pad 1 = anodo, pad 2 = catodo (barra de polaridad junto al pad 2)"
  rect 32x37 smd: 1(-32,0) 2(32,0)
  silkscreen extent 5,-13 5,13, body extent -16,-32 16,32, height 28
MH_M3 [mil] "Agujero de montaje M3 NO chapado (NPTH) taladro 3.2 mm, sin cobre; exclusion de cobre/ruteo r=3.5 mm"
  round 126 hole 125.98 unplated: 0(0,0)
  Keep-Out Layer circle w10: c0,0 r138
  silkscreen extent -146,-146 146,146
MODULE_Ra-01H [mil] "Modulo LoRa Ai-Thinker Ra-01H 16 x 17 castellado (1 ANT, 2 GND, 3 3V3 ... 16 GND)"
  rect 77x47 smd: 1(-305,276) 2(-305,197) 3(-305,118) 4(-305,39) 5(-305,-39) 6(-305,-118) 7(-305,-197) 8(-305,-276) 9(305,-276) 10(305,-197) 11(305,-118) 12(305,-39) 13(305,39) 14(305,118) 15(305,197) 16(305,276)
  silkscreen extent -375,-335 315,335, body extent -315,-335 315,335, height 126
QFN-28-EP_5x5_P0.5 [mil] "QFN-28 5x5 CP2102N"
  rect 37x12 smd: 1(-94,59) 2(-94,39) 3(-94,20) 4(-94,0) 5(-94,-20) 6(-94,-39) 7(-94,-59) 15(94,-59) 16(94,-39) 17(94,-20) 18(94,0) 19(94,20) 20(94,39) 21(94,59)
  rect 12x37 smd: 8(-59,-94) 9(-39,-94) 10(-20,-94) 11(0,-94) 12(20,-94) 13(39,-94) 14(59,-94) 22(59,94) 23(39,94) 24(20,94) 25(0,94) 26(-20,94) 27(-39,94) 28(-59,94)
  rect 132x132 smd: 29(0,0)
  silkscreen extent -145,-98 98,98, body extent -99,-99 99,99, height 37
R_0603 [mil] "Resistencia/condensador 0603 (1608 metrico)"
  rect 32x37 smd: 1(-32,0) 2(32,0)
  body extent -32,-16 32,16, height 18
RELAY_SRD-05VDC-SL-C [mil] "Rele Songle SRD-05VDC-SL-C vista superior: 1-2 bobina, 3 COM, 4 NC, 5 NO (hole 1.3mm)"
  round 94 hole 51: 1(-201,-236) 2(-201,236) 3(-280,0) 4(280,236) 5(280,-236)
  silkscreen extent -343,-307 413,307, body extent -338,-315 418,307, height 606
RJ45_HR911105A [mil] "RJ45 HanRun HR911105A con magneticos y 2 LED (vista superior, frente del conector hacia abajo)"
  round 165 hole 127.95 unplated: 0(-225,76) 0(225,76)
  rect 59x59 hole 35: 1(175,-174)
  round 59 hole 35: 2(125,-274) 3(75,-174) 4(25,-274) 5(-25,-174) 6(-75,-274) 7(-125,-174) 8(-175,-274)
  round 71 hole 40: 9(261,268) 10(161,268) 11(-161,268) 12(-261,268)
  round 102 hole 64: SH(-305,-45) SH(305,-45)
  silkscreen extent -316,-334 316,505, body extent -312,-335 312,516, height 545
SOIC-8-EP_MP1584 [mil] "SOIC-8E exposed pad MP1584EN"
  rect 63x24 smd: 1(-106,75) 2(-106,25) 3(-106,-25) 4(-106,-75) 5(106,-75) 6(106,-25) 7(106,25) 8(106,75)
  rect 103x138 smd: 9(0,0)
  silkscreen extent -169,-96 63,96, body extent -118,-96 118,96, height 67
SOIC-8_3.9x4.9_P1.27 [mil] "SOIC-8 narrow MS-012 AT24C256C / DS1307Z"
  rect 61x24 smd: 1(-106,75) 2(-106,25) 3(-106,-25) 4(-106,-75) 5(106,-75) 6(106,-25) 7(106,25) 8(106,75)
  silkscreen extent -168,-96 64,96, body extent -118,-96 118,96, height 67
SOIC-16_3.9x9.9_P1.27 [mil] "SOIC-16 narrow MCP3208"
  rect 59x24 smd: 1(-106,175) 2(-106,125) 3(-106,75) 4(-106,25) 5(-106,-25) 6(-106,-75) 7(-106,-125) 8(-106,-175) 9(106,-175) 10(106,-125) 11(106,-75) 12(106,-25) 13(106,25) 14(106,75) 15(106,125) 16(106,175)
  silkscreen extent -167,-195 65,195, body extent -118,-195 118,195, height 75
SOIC-28W_7.5x17.9_P1.27 [mil] "SOIC-28 wide ENC28J60-I/SO"
  rect 79x24 smd: 1(-185,325) 2(-185,275) 3(-185,225) 4(-185,175) 5(-185,125) 6(-185,75) 7(-185,25) 8(-185,-25) 9(-185,-75) 10(-185,-125) 11(-185,-175) 12(-185,-225) 13(-185,-275) 14(-185,-325) 15(185,-325) 16(185,-275) 17(185,-225) 18(185,-175) 19(185,-125) 20(185,-75) 21(185,-25) 22(185,25) 23(185,75) 24(185,125) 25(185,175) 26(185,225) 27(185,275) 28(185,325)
  silkscreen extent -256,-352 148,352, body extent -205,-352 205,352, height 112
SOP-4_PC817X_L10.16 [mil] "Fotoacoplador SMD-4 gullwing Sharp PC817X*CSP9F: 1 A, 2 K, 3 E, 4 C"
  rect 89x62 smd: 1(-175,50) 2(-175,-50) 3(175,-50) 4(175,50)
  silkscreen extent -252,-91 128,91, body extent -201,-91 201,91, height 152
SOT-23-3_DBZ [mil] "SOT-23-3 REF3033 / BAT54S / AO3400A / S8050 - TI DBZ land pattern"
  rect 41x24 smd: 1(-47,37) 2(-47,-37) 3(47,0)
  silkscreen extent -99,-57 26,57, body extent -55,-57 55,57, height 43
SOT-23-5_DBV [mil] "SOT-23-5 (DBV) TLV62569 / TLV75533 - TI DBV0005A"
  rect 43x24 smd: 1(-51,37) 2(-51,0) 3(-51,-37) 4(51,-37) 5(51,37)
  silkscreen extent -104,-57 32,57, body extent -59,-57 59,57, height 49
SOT-23-6_SRV05-4 [mil] "SOT-23-6 SRV05-4.TCT - patron Semtech"
  rect 43x24 smd: 1(-49,37) 2(-49,0) 3(-49,-37) 4(49,-37) 5(49,0) 6(49,37)
  silkscreen extent -102,-57 16,57, body extent -55,-57 55,57, height 65
SOT-23-6_USBLC6 [mil] "SOT-23-6 USBLC6-2SC6 - patron ST"
  rect 47x24 smd: 1(-45,37) 2(-45,0) 3(-45,-37) 4(45,-37) 5(45,0) 6(45,37)
  silkscreen extent -100,-57 10,57, body extent -55,-57 55,57, height 65
SW_TS-1187A [mil] "Pulsador SMD 5.1x5.1 XKB TS-1187A; pads superiores = 1, inferiores = 2"
  rect 79x59 smd: 1(-98,59) 1(98,59) 2(-98,-59) 2(98,-59)
  silkscreen extent -169,-100 100,100, body extent -128,-102 128,102, height 61
TB_DB127S-5.08-5P [mil] "Bornera tornillo 5 polos 5.08mm Dorabo DB127S (hole 1.4mm, pad 2.6mm)"
  rect 102x102 hole 55: 1(-400,0)
  round 102 hole 55: 2(-200,0) 3(0,0) 4(200,0) 5(400,0)
  silkscreen extent -520,-236 520,236, body extent -520,-236 520,236, height 429
TB_KF128-5.08-2P [mil] "Bornera tornillo 2 polos 5.08mm KF128 (hole 1.4mm, pad 2.6mm)"
  rect 102x102 hole 55: 1(-100,0)
  round 102 hole 55: 2(100,0)
  silkscreen extent -200,-211 200,211, body extent -224,-213 200,209, height 555
TB_KF128-5.08-3P [mil] "Bornera tornillo 3 polos 5.08mm KF128 (hole 1.4mm, pad 2.6mm)"
  rect 102x102 hole 55: 1(-200,0)
  round 102 hole 55: 2(0,0) 3(200,0)
  silkscreen extent -300,-211 300,211, body extent -324,-213 300,209, height 555
TP_PAD_1.5mm [mil] "Punto de prueba: almohadilla desnuda redonda 1.5 mm (sin pieza)"
  round 59 smd: 1(0,0)
TSSOP-14_PW_P0.65 [mil] "TSSOP-14 TLV9004IPWR"
  rect 59x18 smd: 1(-114,77) 2(-114,51) 3(-114,26) 4(-114,0) 5(-114,-26) 6(-114,-51) 7(-114,-77) 8(114,-77) 9(114,-51) 10(114,-26) 11(114,0) 12(114,26) 13(114,51) 14(114,77)
  silkscreen extent -175,-98 87,98, body extent -118,-98 118,98, height 43
UFL_R_SMT_1 [mil] "Conector U.FL receptaculo Hirose U.FL-R-SMT-1; pad 1 = senal, pads 2 = GND"
  rect 39x41 smd: 1(0,-41)
  rect 41x87 smd: 2(-58,19) 2(58,19)
  silkscreen extent -61,-42 61,80, body extent -59,-67 59,51, height 50
USB-C_TYPE-C-31-M-12 [mil] "Receptaculo USB Type-C 16P SMD HRO TYPE-C-31-M-12 (borde de placa a 6.86 de la fila de pads)"
  round 28 hole 24 unplated: 0(-114,57) 0(114,57)
  rect 24x45 smd: A1B12(-126,99) A4B9(-94,99) B1A12(126,99) B4A9(94,99)
  rect 12x45 smd: A5(-49,99) A6(-10,99) A7(10,99) A8(49,99) B5(69,99) B6(30,99) B7(-30,99) B8(-69,99)
  oval 35x79 hole 24 slot 66.93 at 90 deg: S1(-170,77) S1(170,77)
  oval 35x67 hole 24 slot 55.12 at 90 deg: S1(-170,-88) S1(170,-88)
  silkscreen extent -176,-161 176,25, body extent -176,-190 176,121, height 128
XTAL_3225_4P [mil] "Cristal SMD 3.2x2.5 4 pads YXC YSX321SL (1,3 cristal; 2,4 GND)"
  rect 55x47 smd: 1(-43,-33) 2(43,-33) 3(43,33) 4(-43,33)
  silkscreen extent -102,-39 -90,-27, body extent -63,-49 63,49, height 28
XTAL_MC-146 [mil] "Cristal 32.768kHz Epson MC-146 (terminales #1 y #4 activos; #2/#3 mecanicos)"
  rect 47x24 smd: 1(-124,-18) 2(124,-18) 3(124,18) 4(-124,18)
  silkscreen extent -179,-30 89,30, body extent -133,-30 133,30, height 56

## Part data
BT1: library part BAT-HLD-001, "Portapilas CR2032 SMD (TE BAT-HLD-001); pad 1 = (+) dos pestanas laterales, pad 2 = (-) pad central", LCSC Part #=C7501066, Manufacturer="TE Connectivity", Datasheet=https://wmsc.lcsc.com/wmsc/upload/file/pdf/v2/lcsc/2411212321_TE-Connectivity-BAT-HLD-001_C7501066.pdf, Manufacturer Part Number=BAT-HLD-001, Supplier 1=LCSC, Supplier Part Number 1=C7501066
C1: library part CAP_0603, "Condensador ceramico SMD 0603", LCSC Part #=C1622, Manufacturer=Samsung, Manufacturer Part Number=CL10B473KB8NNNC, Datasheet=https://wmsc.lcsc.com/wmsc/upload/file/pdf/v2/lcsc/2206010045_UNI-ROYAL-Uniroyal-Elec-0603WAF1002T5E_C25804.pdf, Supplier 1=LCSC, Supplier Part Number 1=C1622
C2 C14 C17 C18 C23 C29: library part CAP_0603, "Condensador ceramico SMD 0603", LCSC Part #=C15849, Manufacturer=Samsung, Manufacturer Part Number=CL10A105KB8NNNC, Datasheet=https://wmsc.lcsc.com/wmsc/upload/file/pdf/v2/lcsc/2206010045_UNI-ROYAL-Uniroyal-Elec-0603WAF1002T5E_C25804.pdf, Supplier 1=LCSC, Supplier Part Number 1=C15849
C3 C6 C7 C12 C16 C19 C22 C24 C25 C26 C27 C28 C30 C31 C32 C33 C34 C35 C36 C37 C38 C39 C40 C42 C43 C44 C45 C46 C47 C48 C53 C55 C57: library part CAP_0603, "Condensador ceramico SMD 0603", LCSC Part #=C14663, Manufacturer=YAGEO, Manufacturer Part Number=CC0603KRX7R9BB104, Datasheet=https://wmsc.lcsc.com/wmsc/upload/file/pdf/v2/lcsc/2206010045_UNI-ROYAL-Uniroyal-Elec-0603WAF1002T5E_C25804.pdf, Supplier 1=LCSC, Supplier Part Number 1=C14663
C4 C5: library part CAP_1210, "Condensador ceramico SMD 1210", LCSC Part #=C138687, Manufacturer=Samsung, Manufacturer Part Number=CL32B106KBJNNNE, Datasheet=https://wmsc.lcsc.com/wmsc/upload/file/pdf/v2/lcsc/2206010045_UNI-ROYAL-Uniroyal-Elec-0603WAF1002T5E_C25804.pdf, Supplier 1=LCSC, Supplier Part Number 1=C138687
C8: library part CAP_0603, "Condensador ceramico SMD 0603", LCSC Part #=C37298, Manufacturer=Samsung, Manufacturer Part Number=CL10C151JB8NNNC, Datasheet=https://wmsc.lcsc.com/wmsc/upload/file/pdf/v2/lcsc/2206010045_UNI-ROYAL-Uniroyal-Elec-0603WAF1002T5E_C25804.pdf, Supplier 1=LCSC, Supplier Part Number 1=C37298
C9 C10: library part CAP_0805, "Condensador ceramico SMD 0805", LCSC Part #=C98190, Manufacturer=Samsung, Manufacturer Part Number=CL21A226MOQNNNE, Datasheet=https://wmsc.lcsc.com/wmsc/upload/file/pdf/v2/lcsc/2206010045_UNI-ROYAL-Uniroyal-Elec-0603WAF1002T5E_C25804.pdf, Supplier 1=LCSC, Supplier Part Number 1=C98190
C11 C58: library part CAP_0805, "Condensador ceramico SMD 0603", LCSC Part #=C1713, Manufacturer=Samsung, Manufacturer Part Number=CL21A106KOQNNNE, Datasheet=https://wmsc.lcsc.com/wmsc/upload/file/pdf/v2/lcsc/2206010045_UNI-ROYAL-Uniroyal-Elec-0603WAF1002T5E_C25804.pdf, Supplier 1=LCSC, Supplier Part Number 1=C1713
C13 C20 C52: library part CAP_0805, "Condensador ceramico SMD 0805", LCSC Part #=C29277, Manufacturer=Samsung, Manufacturer Part Number=CL21A226MPQNNNE, Datasheet=https://wmsc.lcsc.com/wmsc/upload/file/pdf/v2/lcsc/2206010045_UNI-ROYAL-Uniroyal-Elec-0603WAF1002T5E_C25804.pdf, Supplier 1=LCSC, Supplier Part Number 1=C29277
C15 C21 C41 C51: library part CAP_0603, "Condensador ceramico SMD 0603", LCSC Part #=C19702, Manufacturer=Samsung, Manufacturer Part Number=CL10A106KP8NNNC, Datasheet=https://wmsc.lcsc.com/wmsc/upload/file/pdf/v2/lcsc/2206010045_UNI-ROYAL-Uniroyal-Elec-0603WAF1002T5E_C25804.pdf, Supplier 1=LCSC, Supplier Part Number 1=C19702
C49 C50: library part CAP_0603, "Condensador ceramico SMD 0603", LCSC Part #=C1647, Manufacturer=Samsung, Manufacturer Part Number=CL10C180JB8NNNC, Datasheet=https://wmsc.lcsc.com/wmsc/upload/file/pdf/v2/lcsc/2206010045_UNI-ROYAL-Uniroyal-Elec-0603WAF1002T5E_C25804.pdf, Supplier 1=LCSC, Supplier Part Number 1=C1647
C54 C56: library part CAP_0603, "Condensador ceramico SMD 0603", LCSC Part #=C1705, Manufacturer=Samsung, Manufacturer Part Number=CL10A475KP8NNNC, Datasheet=https://wmsc.lcsc.com/wmsc/upload/file/pdf/v2/lcsc/2206010045_UNI-ROYAL-Uniroyal-Elec-0603WAF1002T5E_C25804.pdf, Supplier 1=LCSC, Supplier Part Number 1=C1705
D1 D2 D4: "Diodo Schottky 40V 5A SMA (MDD SS54)", LCSC Part #=C18199169, Manufacturer=hongjiacheng, Datasheet=https://wmsc.lcsc.com/wmsc/upload/file/pdf/v2/lcsc/2407101107_MDD-Microdiode-Semiconductor-SS54_C22452.pdf, Manufacturer Part Number=SS56, Supplier 1=LCSC, Supplier Part Number 1=C18199169
D3: "TVS unidireccional 28V 600W SMB (Littelfuse SMBJ28A)", LCSC Part #=C178227, Manufacturer=Littelfuse, Datasheet=https://wmsc.lcsc.com/wmsc/upload/file/pdf/v2/lcsc/2304140030_Littelfuse-SMBJ28A_C178227.pdf, Manufacturer Part Number=SMBJ28A, Supplier 1=LCSC, Supplier Part Number 1=C178227
D5: library part LED_0603, "LED SMD 0603", LCSC Part #=C2286, Manufacturer="Hubei KENTO", Manufacturer Part Number=KT-0603R, Datasheet=https://wmsc.lcsc.com/wmsc/upload/file/pdf/v2/lcsc/2206010045_UNI-ROYAL-Uniroyal-Elec-0603WAF1002T5E_C25804.pdf, Supplier 1=LCSC, Supplier Part Number 1=C2286
D6: "Matriz TVS 4 lineas 5V SOT-23-6 (Semtech SRV05-4.TCT)", LCSC Part #=C13612, Manufacturer=Semtech, Datasheet=https://wmsc.lcsc.com/wmsc/upload/file/pdf/v2/lcsc/1809212114_SEMTECH-SRV05-4-TCT_C13612.pdf, Manufacturer Part Number=SRV05-4.TCT, Supplier 1=LCSC, Supplier Part Number 1=C13612
D7: "Proteccion ESD USB 2 lineas + VBUS SOT-23-6 (ST USBLC6-2SC6)", LCSC Part #=C7519, Manufacturer=STMicroelectronics, Datasheet=https://wmsc.lcsc.com/wmsc/upload/file/pdf/v2/lcsc/2410121836_STMicroelectronics-USBLC6-2SC6_C7519.pdf, Manufacturer Part Number=USBLC6-2SC6, Supplier 1=LCSC, Supplier Part Number 1=C7519
D8 D9: "Diodo de conmutacion 75V 150mA SOD-123 (Semtech 1N4148W)", LCSC Part #=C81598, Manufacturer=Semtech, Datasheet=https://wmsc.lcsc.com/wmsc/upload/file/pdf/v2/lcsc/1811061725_ST-Semtech-1N4148W_C81598.pdf, Manufacturer Part Number=1N4148W, Supplier 1=LCSC, Supplier Part Number 1=C81598
D10: library part LED_0603, "LED SMD 0603", LCSC Part #=C12624, Manufacturer="Hubei KENTO", Manufacturer Part Number=KT-0603G, Datasheet=https://wmsc.lcsc.com/wmsc/upload/file/pdf/v2/lcsc/2206010045_UNI-ROYAL-Uniroyal-Elec-0603WAF1002T5E_C25804.pdf, Supplier 1=LCSC, Supplier Part Number 1=C12624
D11: library part LED_0603, "LED SMD 0603", LCSC Part #=C965803, Manufacturer=XINGLIGHT, Manufacturer Part Number=XL-1608UYC-04, Datasheet=https://wmsc.lcsc.com/wmsc/upload/file/pdf/v2/lcsc/2206010045_UNI-ROYAL-Uniroyal-Elec-0603WAF1002T5E_C25804.pdf, Supplier 1=LCSC, Supplier Part Number 1=C965803
D12 D13 D14 D15 D16 D17 D18 D19: library part BAT54S,215, "Doble diodo Schottky en serie 30V 200mA SOT-23 (Nexperia BAT54S,215)", LCSC Part #=C47546, Manufacturer=Nexperia, Datasheet=https://wmsc.lcsc.com/wmsc/upload/file/pdf/v2/lcsc/2410121943_Nexperia-BAT54S-215_C47546.pdf, Manufacturer Part Number=BAT54S,215, Supplier 1=LCSC, Supplier Part Number 1=C47546
F1: library part FUSE_1206, "Fusible SMD 1206 2A 63V (Littelfuse 0466002.NRHF)", LCSC Part #=C3105, Manufacturer=Littelfuse, Manufacturer Part Number=0466002.NRHF, Datasheet=https://wmsc.lcsc.com/wmsc/upload/file/pdf/v2/lcsc/1810111920_Littelfuse-0466002-NRHF_C3105.pdf, Supplier 1=LCSC, Supplier Part Number 1=C3105
FB1: library part FERRITE_0805, "Ferrita 220R@100MHz 0805 (Murata BLM21PG221SN1D)", LCSC Part #=C85840, Manufacturer=Murata, Datasheet=https://wmsc.lcsc.com/wmsc/upload/file/pdf/v2/lcsc/2304140030_Murata-Electronics-BLM21PG221SN1D_C85840.pdf, Manufacturer Part Number=BLM21PG221SN1D, Supplier 1=LCSC, Supplier Part Number 1=C85840
J1 J2: library part KF128-5.08-2P-AA, "Bornera tornillo 2 polos paso 5.08mm (Cixi Kefa KF128-5.08-2P-AA)", LCSC Part #=C474952, Manufacturer="Cixi Kefa Electronics (KEFA)", Datasheet=https://wmsc.lcsc.com/wmsc/upload/file/pdf/v2/lcsc/2408211511_Cixi-Kefa-Elec-KF128-5-08-2P-AA_C474952.pdf, Manufacturer Part Number=KF128-5.08-2P-AA, Supplier 1=LCSC, Supplier Part Number 1=C474952
J3: library part HDR_1x4_2.54_F, "Cabezal hembra 1x4 paso 2.54mm para modulo OLED I2C (Boomele 2.54-1*4PFemale); orden GND-VCC-SCL-SDA (a confirmar con el modulo real)", LCSC Part #=C2718488, Manufacturer=Boomele, Manufacturer Part Number=2.54-1*4PFemale, Datasheet=https://wmsc.lcsc.com/wmsc/upload/file/pdf/v2/lcsc/2412111658_BOOMELE-Boom-Precision-Elec-2-54-1-4P_C2718488.pdf, Supplier 1=LCSC, Supplier Part Number 1=C2718488
J4 J5: library part DB127S-5.08-5P-GN-S, "Bornera tornillo 5 polos paso 5.08mm (Dorabo DB127S-5.08-5P-GN-S)", LCSC Part #=C2997522, Manufacturer=Dorabo, Datasheet=https://wmsc.lcsc.com/wmsc/upload/file/pdf/v2/lcsc/2303211600_DORABO-DB127S-5-08-5P-GN_C2997522.pdf, Manufacturer Part Number=DB127S-5.08-5P-GN-S, Supplier 1=LCSC, Supplier Part Number 1=C2997522
J6: "RJ45 con magneticos 1CT:1CT y 2 LED, 10/100 (HanRun HR911105A); P8 = CHS GND; LED verde 9(A)-10(K), amarillo 12(A)-11(K)", LCSC Part #=C12074, Manufacturer=HanRun, Datasheet=https://wmsc.lcsc.com/wmsc/upload/file/pdf/v2/lcsc/2409302333_HANRUN-Zhongshan-HanRun-Elec-HR911105A_C12074.pdf, Manufacturer Part Number=HR911105A, Supplier 1=LCSC, Supplier Part Number 1=C12074
J7: library part UFL-R-SMT-1, "Conector coaxial U.FL receptaculo SMD (Hirose U.FL-R-SMT-1(10)); 1 = senal, 2 = GND (2 pads)", LCSC Part #=C88373, Manufacturer="Hirose Electric (HRS)", Manufacturer Part Number=U.FL-R-SMT-1(10), Datasheet=https://wmsc.lcsc.com/wmsc/upload/file/pdf/v2/lcsc/2206010045_UNI-ROYAL-Uniroyal-Elec-0603WAF1002T5E_C25804.pdf, Supplier 1=LCSC, Supplier Part Number 1=C88373
J8: "Receptaculo USB Type-C 16 pines SMD (HRO TYPE-C-31-M-12); pads fusionados A1/B12, A4/B9, B4/A9, B1/A12", LCSC Part #=C165948, Manufacturer="Korean Hroparts Elec (HRO)", Datasheet=https://wmsc.lcsc.com/wmsc/upload/file/pdf/v2/lcsc/2205251630_Korean-Hroparts-Elec-TYPE-C-31-M-12_C165948.pdf, Manufacturer Part Number=TYPE-C-31-M-12, Supplier 1=LCSC, Supplier Part Number 1=C165948
J9 J10: library part KF128-5.08-3P-AA, "Bornera tornillo 3 polos paso 5.08mm (Cixi Kefa KF128-5.08-3P-AA)", LCSC Part #=C474953, Manufacturer="Cixi Kefa Electronics (KEFA)", Datasheet=https://wmsc.lcsc.com/wmsc/upload/file/pdf/v2/lcsc/2408211511_Cixi-Kefa-Elec-KF128-5-08-3P-AA_C474953.pdf, Manufacturer Part Number=KF128-5.08-3P-AA, Supplier 1=LCSC, Supplier Part Number 1=C474953
K1 K2: library part SRD-05VDC-SL-C, "Rele SPDT 5V bobina 70 ohm (Songle SRD-05VDC-SL-C); 1-2 bobina, 3 COM, 4 NC, 5 NO", LCSC Part #=C35449, Manufacturer="Songle Relay", Datasheet=https://wmsc.lcsc.com/wmsc/upload/file/pdf/v2/lcsc/2304140030_Ningbo-Songle-Relay-SRD-05VDC-SL-C_C35449.pdf, Manufacturer Part Number=SRD-05VDC-SL-C, Supplier 1=LCSC, Supplier Part Number 1=C35449
L1: library part IND_SRP7050TA, "Inductor de potencia 22uH 7.3x6.6mm (Bourns SRP7050TA-220M)", LCSC Part #=C1332438, Manufacturer=Bourns, Manufacturer Part Number=SRP7050TA-220M, Datasheet=https://wmsc.lcsc.com/wmsc/upload/file/pdf/v2/lcsc/2304140030_BOURNS-SRP7050TA-220M_C1332438.pdf, Supplier 1=LCSC, Supplier Part Number 1=C1332438
L2: library part IND_NRS4018, "Inductor de potencia 2.2uH 4x4mm (Taiyo Yuden NRS4018T2R2MDGJ)", LCSC Part #=C92959, Manufacturer="Taiyo Yuden", Manufacturer Part Number=NRS4018T2R2MDGJ, Datasheet=https://wmsc.lcsc.com/wmsc/upload/file/pdf/v2/lcsc/2211282300_Taiyo-Yuden-NRS4018T2R2MDGJ_C92959.pdf, Supplier 1=LCSC, Supplier Part Number 1=C92959
MH1 MH2 MH3 MH4: "Agujero de montaje M3 NPTH (sin pines, sin red)", Manufacturer=n/a, Manufacturer Part Number=MH_M3_NPTH
Q1 Q2: "Transistor NPN 25V 500mA SOT-23 (Changjing S8050 J3Y)", LCSC Part #=C2146, Manufacturer="Jiangsu Changjing Electronics Technology (CJ)", Manufacturer Part Number=S8050, Datasheet=https://wmsc.lcsc.com/wmsc/upload/file/pdf/v2/lcsc/2310131500_Jiangsu-Changjing-Electronics-Technology-Co---Ltd--S8050-J3Y-RANGE-200-350_C2146.pdf, Supplier 1=LCSC, Supplier Part Number 1=C2146
Q3 Q4: "MOSFET canal N 30V 5.7A SOT-23 (Alpha and Omega AO3400A)", LCSC Part #=C20917, Manufacturer="Alpha & Omega Semiconductor", Datasheet=https://wmsc.lcsc.com/wmsc/upload/file/pdf/v2/lcsc/1811081213_Alpha---Omega-Semicon-AO3400A_C20917.pdf, Manufacturer Part Number=AO3400A, Supplier 1=LCSC, Supplier Part Number 1=C20917
R1: library part RES_0603, "Resistencia SMD 0603", LCSC Part #=C861479, Manufacturer=YAGEO, Manufacturer Part Number=RT0603BRD07590KL, Datasheet=https://wmsc.lcsc.com/wmsc/upload/file/pdf/v2/lcsc/2206010045_UNI-ROYAL-Uniroyal-Elec-0603WAF1002T5E_C25804.pdf, Supplier 1=LCSC, Supplier Part Number 1=C861479
R2: library part RES_0603, "Resistencia SMD 0603", LCSC Part #=C862235, Manufacturer=YAGEO, Manufacturer Part Number=RT0603BRE0760K4L, Datasheet=https://wmsc.lcsc.com/wmsc/upload/file/pdf/v2/lcsc/2206010045_UNI-ROYAL-Uniroyal-Elec-0603WAF1002T5E_C25804.pdf, Supplier 1=LCSC, Supplier Part Number 1=C862235
R3: library part RES_0603, "Resistencia SMD 0603", LCSC Part #=C2989442, Manufacturer=UNI-ROYAL, Manufacturer Part Number=TC0325B3012T5F, Datasheet=https://wmsc.lcsc.com/wmsc/upload/file/pdf/v2/lcsc/2206010045_UNI-ROYAL-Uniroyal-Elec-0603WAF1002T5E_C25804.pdf, Supplier 1=LCSC, Supplier Part Number 1=C2989442
R4: library part RES_0603, "Resistencia SMD 0603", LCSC Part #=C22861, Manufacturer=UNI-ROYAL, Manufacturer Part Number=0603WAF1182T5E, Datasheet=https://wmsc.lcsc.com/wmsc/upload/file/pdf/v2/lcsc/2206010045_UNI-ROYAL-Uniroyal-Elec-0603WAF1002T5E_C25804.pdf, Supplier 1=LCSC, Supplier Part Number 1=C22861
R5 R6 R8 R9 R13 R66 R71: library part RES_0603, "Resistencia SMD 0603", LCSC Part #=C25803, Manufacturer=UNI-ROYAL, Manufacturer Part Number=0603WAF1003T5E, Datasheet=https://wmsc.lcsc.com/wmsc/upload/file/pdf/v2/lcsc/2206010045_UNI-ROYAL-Uniroyal-Elec-0603WAF1002T5E_C25804.pdf, Supplier 1=LCSC, Supplier Part Number 1=C25803
R7 R57: library part RES_0603, "Resistencia SMD 0603", LCSC Part #=C25961, Manufacturer=UNI-ROYAL, Manufacturer Part Number=0603WAF2212T5E, Datasheet=https://wmsc.lcsc.com/wmsc/upload/file/pdf/v2/lcsc/2206010045_UNI-ROYAL-Uniroyal-Elec-0603WAF1002T5E_C25804.pdf, Supplier 1=LCSC, Supplier Part Number 1=C25961
R10: library part RES_0603, "Resistencia SMD 0603", LCSC Part #=C22952, Manufacturer=UNI-ROYAL, Manufacturer Part Number=0603WAF2103T5E, Datasheet=https://wmsc.lcsc.com/wmsc/upload/file/pdf/v2/lcsc/2206010045_UNI-ROYAL-Uniroyal-Elec-0603WAF1002T5E_C25804.pdf, Supplier 1=LCSC, Supplier Part Number 1=C22952
R11: library part RES_0603, "Resistencia SMD 0603", LCSC Part #=C12447, Manufacturer=UNI-ROYAL, Manufacturer Part Number=0603WAF4022T5E, Datasheet=https://wmsc.lcsc.com/wmsc/upload/file/pdf/v2/lcsc/2206010045_UNI-ROYAL-Uniroyal-Elec-0603WAF1002T5E_C25804.pdf, Supplier 1=LCSC, Supplier Part Number 1=C12447
R12: library part RES_0603, "Resistencia SMD 0603", LCSC Part #=C25818, Manufacturer=UNI-ROYAL, Manufacturer Part Number=0603WAF4533T5E, Datasheet=https://wmsc.lcsc.com/wmsc/upload/file/pdf/v2/lcsc/2206010045_UNI-ROYAL-Uniroyal-Elec-0603WAF1002T5E_C25804.pdf, Supplier 1=LCSC, Supplier Part Number 1=C25818
R14 R15 R19 R20 R21 R22 R23 R25 R39 R41 R43 R45 R53 R54 R61 R62 R64 R69: library part RES_0603, "Resistencia SMD 0603", LCSC Part #=C25804, Manufacturer=UNI-ROYAL, Manufacturer Part Number=0603WAF1002T5E, Datasheet=https://wmsc.lcsc.com/wmsc/upload/file/pdf/v2/lcsc/2206010045_UNI-ROYAL-Uniroyal-Elec-0603WAF1002T5E_C25804.pdf, Supplier 1=LCSC, Supplier Part Number 1=C25804
R16: library part RES_0603, "Resistencia SMD 0603", LCSC Part #=C23065, Manufacturer=UNI-ROYAL, Manufacturer Part Number=0603WAF4990T5E, Datasheet=https://wmsc.lcsc.com/wmsc/upload/file/pdf/v2/lcsc/2206010045_UNI-ROYAL-Uniroyal-Elec-0603WAF1002T5E_C25804.pdf, Supplier 1=LCSC, Supplier Part Number 1=C23065
R17 R18: library part RES_0603, "Resistencia SMD 0603", LCSC Part #=C23162, Manufacturer=UNI-ROYAL, Manufacturer Part Number=0603WAF4701T5E, Datasheet=https://wmsc.lcsc.com/wmsc/upload/file/pdf/v2/lcsc/2206010045_UNI-ROYAL-Uniroyal-Elec-0603WAF1002T5E_C25804.pdf, Supplier 1=LCSC, Supplier Part Number 1=C23162
R24 R26 R29 R32 R35 R38 R40 R42 R44 R56 R67 R72: library part RES_0603, "Resistencia SMD 0603", LCSC Part #=C21190, Manufacturer=UNI-ROYAL, Manufacturer Part Number=0603WAF1001T5E, Datasheet=https://wmsc.lcsc.com/wmsc/upload/file/pdf/v2/lcsc/2206010045_UNI-ROYAL-Uniroyal-Elec-0603WAF1002T5E_C25804.pdf, Supplier 1=LCSC, Supplier Part Number 1=C21190
R27 R30 R33 R36: library part RES_0603, "Resistencia SMD 0603", LCSC Part #=C122538, Manufacturer=YAGEO, Manufacturer Part Number=RT0603BRD07100KL, Datasheet=https://wmsc.lcsc.com/wmsc/upload/file/pdf/v2/lcsc/2206010045_UNI-ROYAL-Uniroyal-Elec-0603WAF1002T5E_C25804.pdf, Supplier 1=LCSC, Supplier Part Number 1=C122538
R28 R31 R34 R37: library part RES_0603, "Resistencia SMD 0603", LCSC Part #=C2989349, Manufacturer=UNI-ROYAL, Manufacturer Part Number=TC0325B4322T5F, Datasheet=https://wmsc.lcsc.com/wmsc/upload/file/pdf/v2/lcsc/2206010045_UNI-ROYAL-Uniroyal-Elec-0603WAF1002T5E_C25804.pdf, Supplier 1=LCSC, Supplier Part Number 1=C2989349
R46: library part RES_0603, "Resistencia SMD 0603", LCSC Part #=C22905, Manufacturer=UNI-ROYAL, Manufacturer Part Number=0603WAF2321T5E, Datasheet=https://wmsc.lcsc.com/wmsc/upload/file/pdf/v2/lcsc/2206010045_UNI-ROYAL-Uniroyal-Elec-0603WAF1002T5E_C25804.pdf, Supplier 1=LCSC, Supplier Part Number 1=C22905
R47 R48 R49 R50: library part RES_0603, "Resistencia SMD 0603", LCSC Part #=C23185, Manufacturer=UNI-ROYAL, Manufacturer Part Number=0603WAF499JT5E, Datasheet=https://wmsc.lcsc.com/wmsc/upload/file/pdf/v2/lcsc/2206010045_UNI-ROYAL-Uniroyal-Elec-0603WAF1002T5E_C25804.pdf, Supplier 1=LCSC, Supplier Part Number 1=C23185
R51 R52 R63 R68: library part RES_0603, "Resistencia SMD 0603", LCSC Part #=C23138, Manufacturer=UNI-ROYAL, Manufacturer Part Number=0603WAF3300T5E, Datasheet=https://wmsc.lcsc.com/wmsc/upload/file/pdf/v2/lcsc/2206010045_UNI-ROYAL-Uniroyal-Elec-0603WAF1002T5E_C25804.pdf, Supplier 1=LCSC, Supplier Part Number 1=C23138
R55: library part RES_0603, "Resistencia SMD 0603", LCSC Part #=C21189, Manufacturer=UNI-ROYAL, Manufacturer Part Number=0603WAF0000T5E, Datasheet=https://wmsc.lcsc.com/wmsc/upload/file/pdf/v2/lcsc/2206010045_UNI-ROYAL-Uniroyal-Elec-0603WAF1002T5E_C25804.pdf, Supplier 1=LCSC, Supplier Part Number 1=C21189
R58: library part RES_0603, "Resistencia SMD 0603", LCSC Part #=C23061, Manufacturer=UNI-ROYAL, Manufacturer Part Number=0603WAF4752T5E, Datasheet=https://wmsc.lcsc.com/wmsc/upload/file/pdf/v2/lcsc/2206010045_UNI-ROYAL-Uniroyal-Elec-0603WAF1002T5E_C25804.pdf, Supplier 1=LCSC, Supplier Part Number 1=C23061
R59 R60: library part RES_0603, "Resistencia SMD 0603", LCSC Part #=C23186, Manufacturer=UNI-ROYAL, Manufacturer Part Number=0603WAF5101T5E, Datasheet=https://wmsc.lcsc.com/wmsc/upload/file/pdf/v2/lcsc/2206010045_UNI-ROYAL-Uniroyal-Elec-0603WAF1002T5E_C25804.pdf, Supplier 1=LCSC, Supplier Part Number 1=C23186
R65 R70: library part RES_0603, "Resistencia SMD 0603", LCSC Part #=C4190, Manufacturer=UNI-ROYAL, Manufacturer Part Number=0603WAF2201T5E, Datasheet=https://wmsc.lcsc.com/wmsc/upload/file/pdf/v2/lcsc/2206010045_UNI-ROYAL-Uniroyal-Elec-0603WAF1002T5E_C25804.pdf, Supplier 1=LCSC, Supplier Part Number 1=C4190
SW1 SW2 SW3 SW4 SW5: library part TS-1187A-B-A-B, "Pulsador tactil SMD 5.1x5.1 (XKB TS-1187A-B-A-B); pads A-B unidos (1) y C-D unidos (2)", LCSC Part #=C318884, Manufacturer="XKB Connection", Datasheet=https://wmsc.lcsc.com/wmsc/upload/file/pdf/v2/lcsc/2304140030_XKB-Connection-TS-1187A-B-A-B_C318884.pdf, Manufacturer Part Number=TS-1187A-B-A-B, Supplier 1=LCSC, Supplier Part Number 1=C318884
TP1 TP2 TP3 TP4 TP5 TP6 TP7 TP8 TP9 TP10 TP11 TP12 TP13 TP14 TP15 TP16 TP17 TP18 TP19 TP20 TP21 TP22 TP23: library part TESTPOINT, "Punto de prueba, pad desnudo de 1.5mm sin montaje", Manufacturer=n/a, Manufacturer Part Number=TP_PAD_1.5mm, Datasheet=https://wmsc.lcsc.com/wmsc/upload/file/pdf/v2/lcsc/2206010045_UNI-ROYAL-Uniroyal-Elec-0603WAF1002T5E_C25804.pdf
U1: "eFuse 4.2-60V, OVP/UVLO ajustables, HTSSOP-16 PowerPAD (TI TPS26600PWPR)", LCSC Part #=C544399, Manufacturer="Texas Instruments", Datasheet=https://wmsc.lcsc.com/wmsc/upload/file/pdf/v2/lcsc/2007161516_Texas-Instruments-TPS26600PWPR_C544399.pdf, Manufacturer Part Number=TPS26600PWPR, Supplier 1=LCSC, Supplier Part Number 1=C544399
U2: "Reductor 3A 28V 1.5MHz SOIC8E con pad expuesto (MPS MP1584EN-LF-Z)", LCSC Part #=C15051, Manufacturer="Monolithic Power Systems", Datasheet=https://wmsc.lcsc.com/wmsc/upload/file/pdf/v2/lcsc/2401301656_Monolithic-Power-Systems-MP1584EN-LF-P_C7304223.pdf, Manufacturer Part Number=MP1584EN-LF-Z, Supplier 1=LCSC, Supplier Part Number 1=C15051
U3: "Reductor sincrono 2A 2.5-5.5V SOT-23-5 (TI TLV62569DBVR)", LCSC Part #=C141836, Manufacturer="Texas Instruments", Datasheet=https://www.ti.com/lit/ds/symlink/tlv62569.pdf, Manufacturer Part Number=TLV62569DBVR, Supplier 1=LCSC, Supplier Part Number 1=C141836
U4: "LDO 500mA 3.3V SOT-23-5 (TI TLV75533PDBVR)", LCSC Part #=C404027, Manufacturer="Texas Instruments", Datasheet=https://wmsc.lcsc.com/wmsc/upload/file/pdf/v2/lcsc/1912111437_Texas-Instruments-TLV75533PDBVR_C404027.pdf, Manufacturer Part Number=TLV75533PDBVR, Supplier 1=LCSC, Supplier Part Number 1=C404027
U5: "Referencia de tension 3.3V 0.2% SOT-23-3 (TI REF3033AIDBZR)", LCSC Part #=C36658, Manufacturer="Texas Instruments", Datasheet=https://wmsc.lcsc.com/wmsc/upload/file/pdf/v2/lcsc/2304140030_Texas-Instruments-REF3033AIDBZR_C36658.pdf, Manufacturer Part Number=REF3033AIDBZR, Supplier 1=LCSC, Supplier Part Number 1=C36658
U6: "Modulo WiFi/BT ESP32-WROOM-32E-N4 (Espressif), 38 pines + pad GND", LCSC Part #=C701341, Manufacturer="Espressif Systems", Datasheet=https://www.espressif.com/sites/default/files/documentation/esp32-wroom-32e_esp32-wroom-32ue_datasheet_en.pdf, Manufacturer Part Number=ESP32-WROOM-32E-N4, Supplier 1=LCSC, Supplier Part Number 1=C701341
U7: "EEPROM I2C 256Kbit SOIC-8 (Microchip AT24C256C-SSHL-T)", LCSC Part #=C6482, Manufacturer="Microchip Technology", Datasheet=https://ww1.microchip.com/downloads/en/DeviceDoc/Atmel-8568-SEEPROM-AT24C256C-Datasheet.pdf, Manufacturer Part Number=AT24C256C-SSHL-T, Supplier 1=LCSC, Supplier Part Number 1=C6482
U8: "RTC I2C 64x8 SOIC-8 150mil (Analog Devices/Maxim DS1307Z+)", LCSC Part #=C1520446, Manufacturer="Analog Devices (Maxim Integrated)", Datasheet=https://www.farnell.com/datasheets/29949.pdf, Manufacturer Part Number=DS1307Z+, Supplier 1=LCSC, Supplier Part Number 1=C1520446
U9: "ADC 12 bits 8 canales SPI SOIC-16 (Microchip MCP3208-CI/SL)", LCSC Part #=C16939, Manufacturer="Microchip Technology", Datasheet=https://ww1.microchip.com/downloads/en/DeviceDoc/21298e.pdf, Manufacturer Part Number=MCP3208-CI/SL, Supplier 1=LCSC, Supplier Part Number 1=C16939
U10 U11: "Amplificador operacional cuadruple RRIO 1MHz TSSOP-14 (TI TLV9004IPWR)", LCSC Part #=C2058050, Manufacturer="Texas Instruments", Datasheet=https://www.ti.com/lit/ds/symlink/tlv9004.pdf, Manufacturer Part Number=TLV9004IPWR, Supplier 1=LCSC, Supplier Part Number 1=C2058050
U12: "Controlador Ethernet 10BASE-T SPI SOIC-28 (Microchip ENC28J60-I/SO)", LCSC Part #=C47351, Manufacturer="Microchip Technology", Datasheet=https://ww1.microchip.com/downloads/en/DeviceDoc/39662e.pdf, Manufacturer Part Number=ENC28J60-I/SO, Supplier 1=LCSC, Supplier Part Number 1=C47351